# Altium PCB F101S3_KSDIY_V2.PcbDoc (part 1 of 2)
Units mil, origin at the board's own origin, x right, y up, seen from the top; angles counter-clockwise.
Board outline 2606.3 x 2883.86 mil, 2 copper layers (Top Layer, Bottom Layer), stack 54.726 mil thick; 152 components, 110 nets, 618 pads, 637 vias.
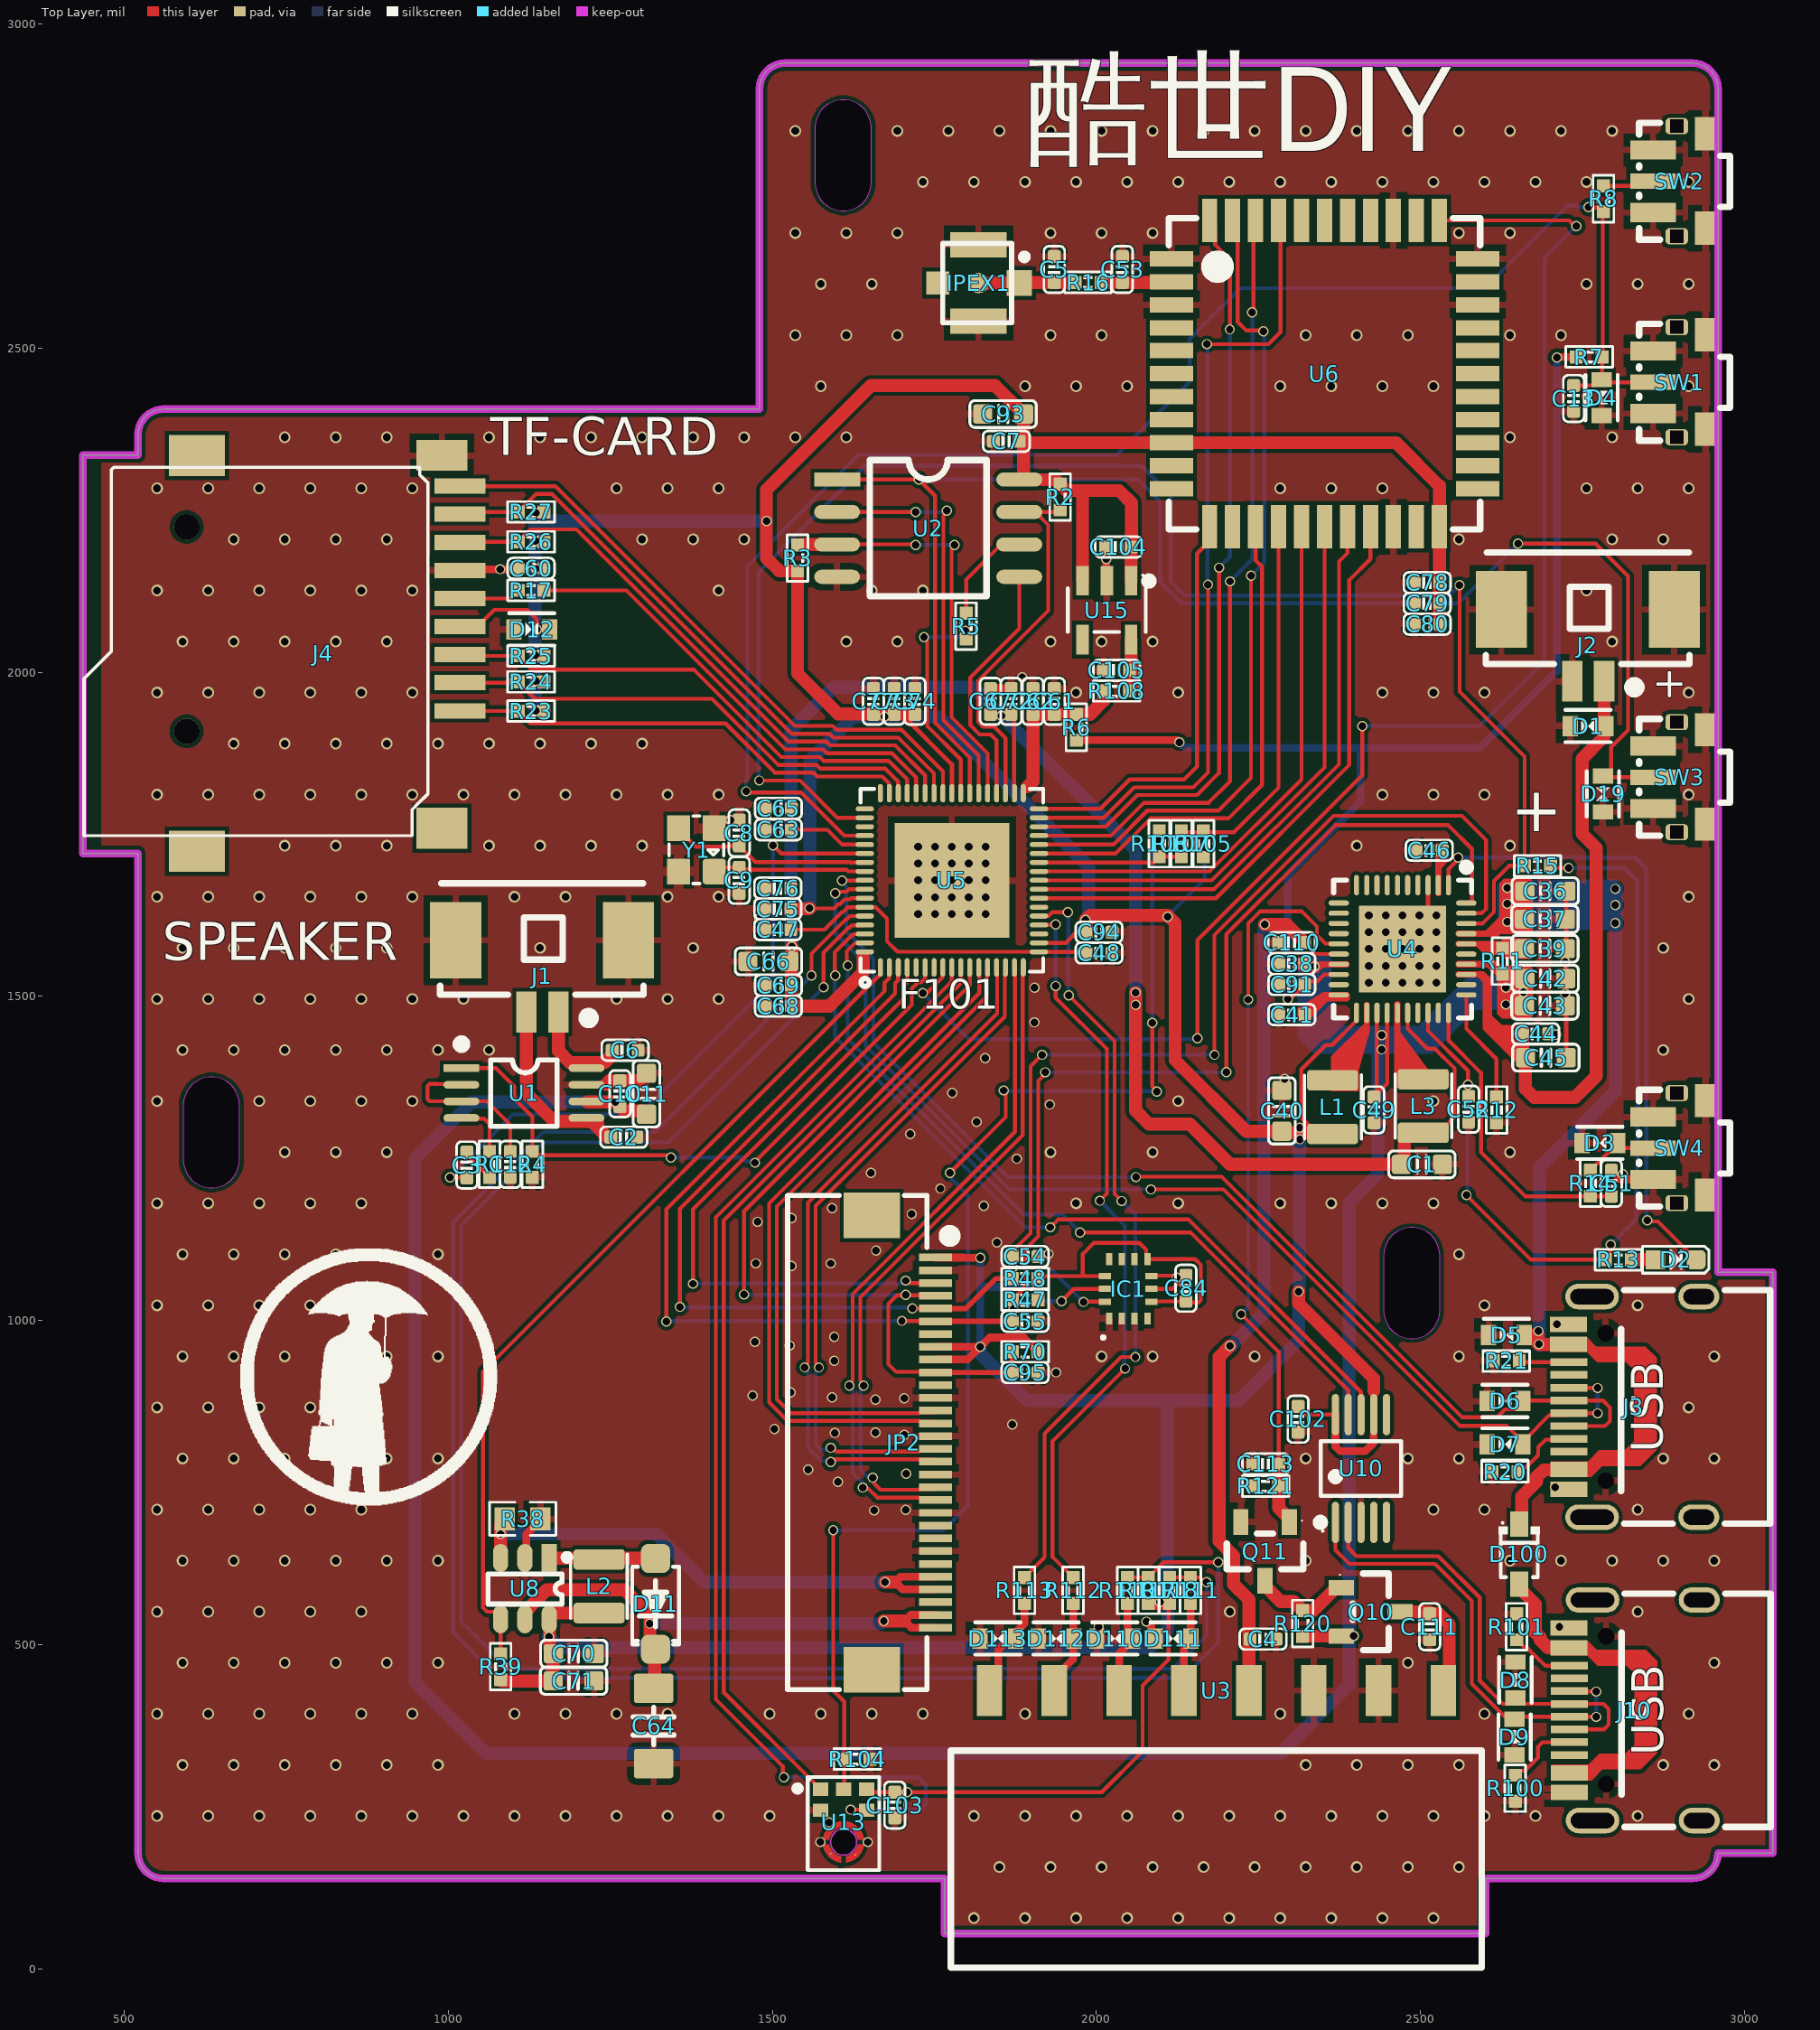
[diagram p0: Top Layer view]
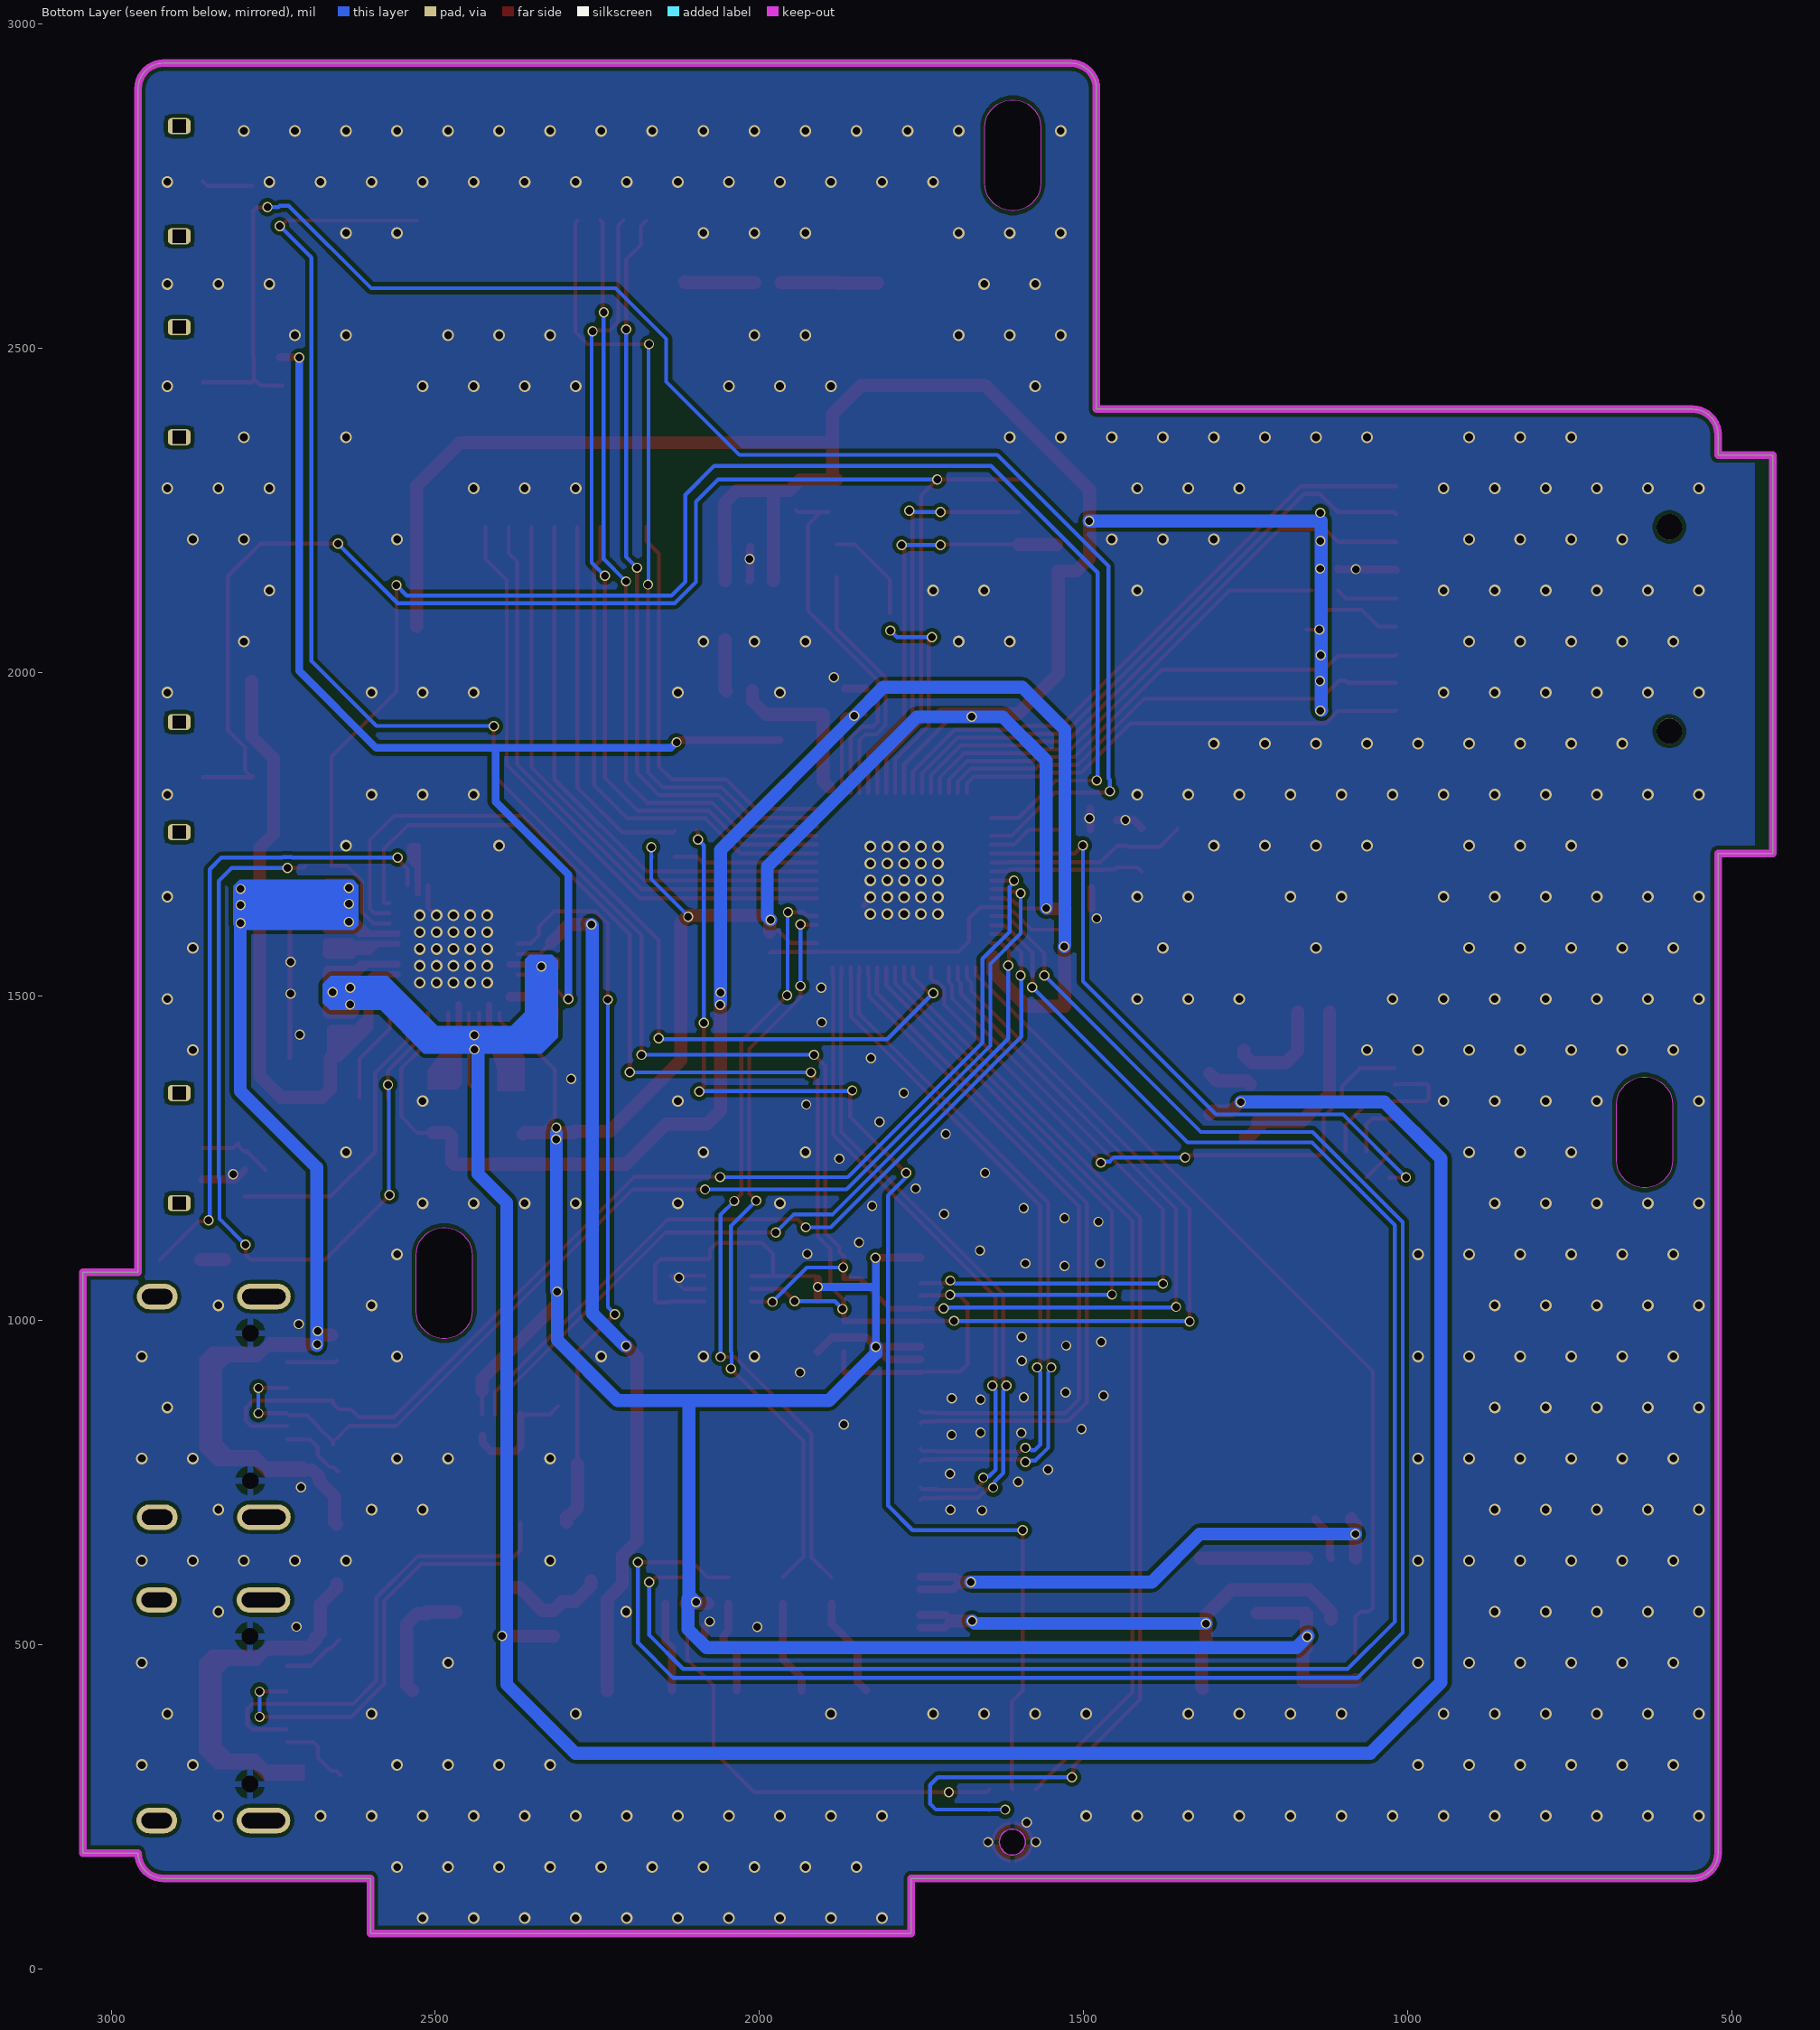
[diagram p1: Bottom Layer view, seen from below]
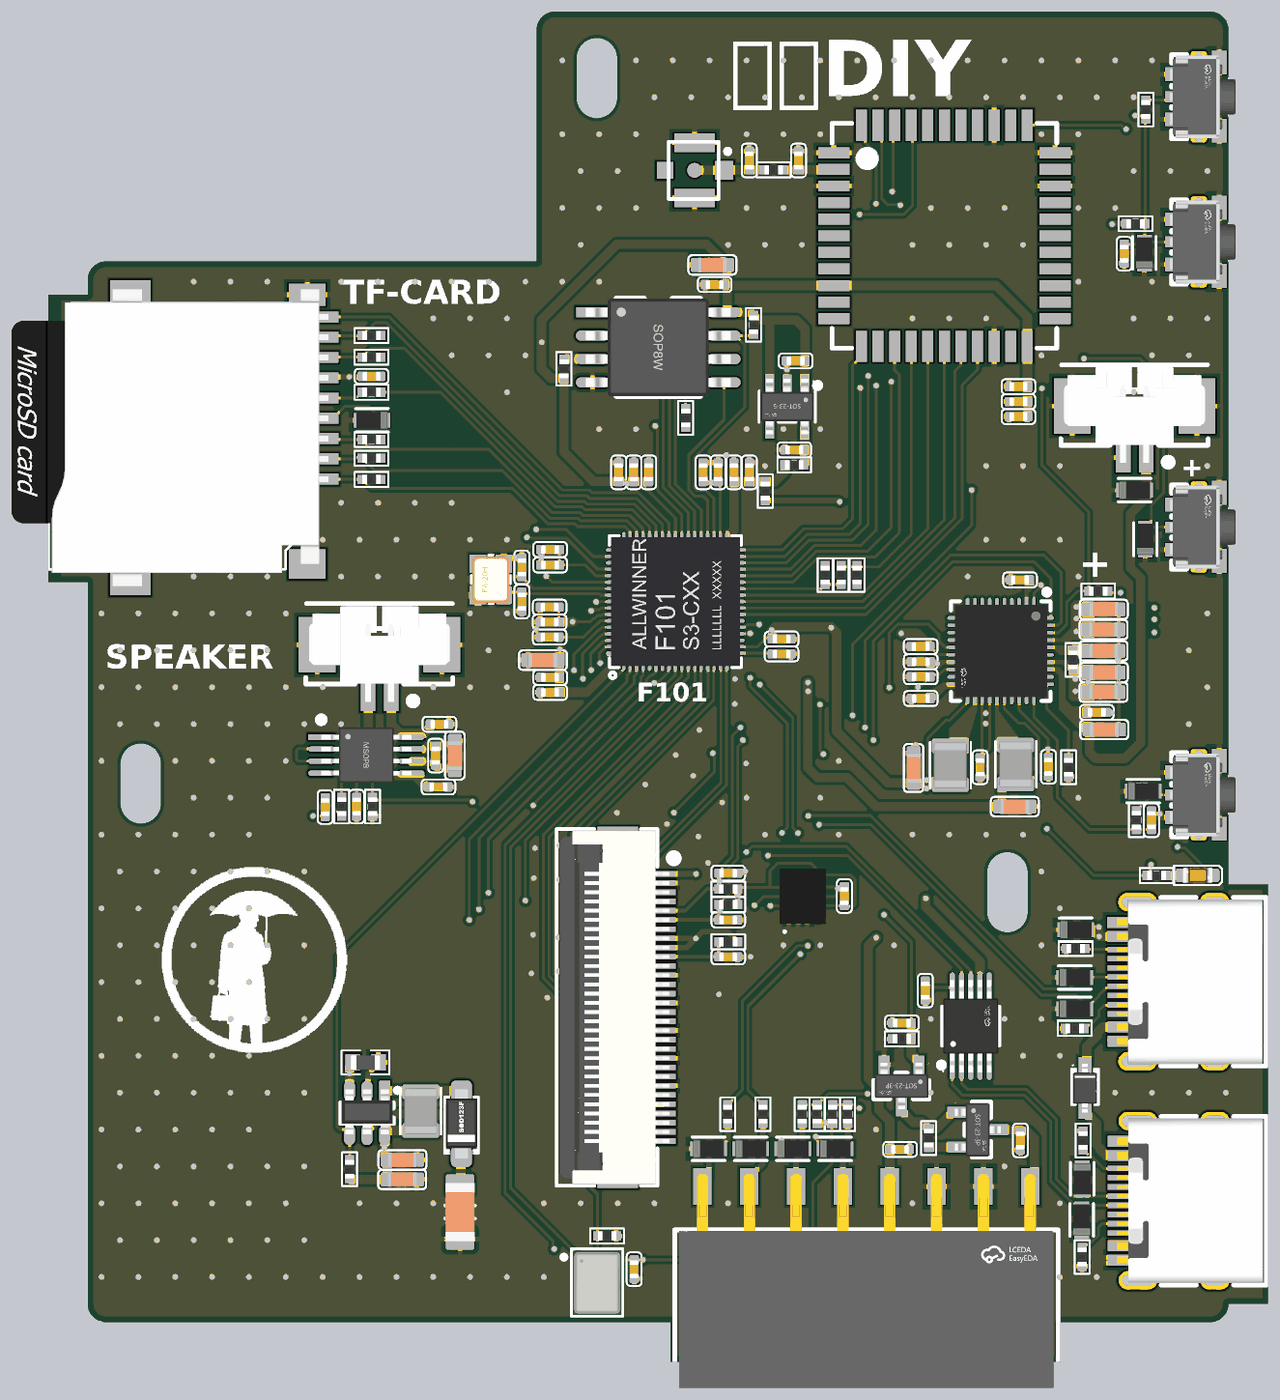
[diagram p3: 3D render of the assembled board from above, using the file's embedded part models]

## Layer stack, top to bottom
Top Solder: solder mask 0.4, Solder Resist, Dk 3.5
Top Layer: signal copper 1.378
Dielectric 1: dielectric 51.9701, FR-4, Dk 4.8
Bottom Layer: signal copper 1.378
Bottom Solder: solder mask 0.4, Solder Resist, Dk 3.5

## Board outline
437.01,1720.47 521.65,1720.47 521.65,179.13 ccw(c561.02,179.13) 561.02,139.76 1766,139.76 1766,55.12 2600,55.12 2600,139.76 2919.29,139.76 ccw(c2919.29,179.13) 2958.66,179.13 3043.31,179.13 3043.31,1074.8 2958.66,1074.8 2958.66,2899.61 ccw(c2919.29,2899.61) 2919.29,2938.98 1519.68,2938.98 ccw(c1519.68,2899.61) 1480.31,2899.61 1480.32,2405.51 561.02,2405.51 ccw(c561.02,2366.14) 521.65,2366.14 521.65,2334.65 437.01,2334.65
cut-out: 1590,196 ccw(c1610,196) 1610,176 ccw(c1610,196) 1630,196 ccw(c1610,196) 1610,216 ccw(c1610,196)
cut-out: 1566.03,2754.68 ccw(c1609.34,2754.68) 1652.65,2754.68 1652.65,2839.33 ccw(c1609.34,2839.33) 1566.03,2839.33
cut-out: 2442.99,1015.72 ccw(c2486.3,1015.72) 2529.61,1015.72 2529.61,1100.36 ccw(c2486.3,1100.36) 2442.99,1100.36
cut-out: 591.61,1247.94 ccw(c634.91,1247.94) 678.22,1247.94 678.22,1332.58 ccw(c634.91,1332.58) 591.61,1332.58

## Design rules (kind name [scope] priority, off if disabled: settings)
Clearance [All] p1: gap=6 ignorepadtopadclearanceinfootprint=FALSE
DiffPairsRouting [All] p1: maxlimit=10 minlimit=6 mostfreqgap=6 substack1={27B4698A-FF65-4D82-99C7-CD1E00C9736D} toplayer_{27b4698a-ff65-4d82-99c7-cd1e00c9736d}_mingap=10 toplayer_{27b4698a-ff65-4d82-99c7-cd1e00c9736d}_prefgap=10 toplayer_{27b4698a-ff65-4d82-99c7-cd1e00c9736d}_minwidth=15 toplayer_{27b4698a-ff65-4d82-99c7-cd1e00c9736d}_maxwidth=15 toplayer_{27b4698a-ff65-4d82-99c7-cd1e00c9736d}_prefwidth=15 bottomlayer_{27b4698a-ff65-4d82-99c7-cd1e00c9736d}_mingap=10 bottomlayer_{27b4698a-ff65-4d82-99c7-cd1e00c9736d}_prefgap=10 bottomlayer_{27b4698a-ff65-4d82-99c7-cd1e00c9736d}_minwidth=15 bottomlayer_{27b4698a-ff65-4d82-99c7-cd1e00c9736d}_maxwidth=15 bottomlayer_{27b4698a-ff65-4d82-99c7-cd1e00c9736d}_prefwidth=15 substack2={09CD6736-9CB1-482A-85FC-D9F62B0C0ECB} toplayer_{09cd6736-9cb1-482a-85fc-d9f62b0c0ecb}_mingap=10 toplayer_{09cd6736-9cb1-482a-85fc-d9f62b0c0ecb}_prefgap=10 toplayer_{09cd6736-9cb1-482a-85fc-d9f62b0c0ecb}_minwidth=15 toplayer_{09cd6736-9cb1-482a-85fc-d9f62b0c0ecb}_maxwidth=15 toplayer_{09cd6736-9cb1-482a-85fc-d9f62b0c0ecb}_prefwidth=15 bottomlayer_{09cd6736-9cb1-482a-85fc-d9f62b0c0ecb}_mingap=10 bottomlayer_{09cd6736-9cb1-482a-85fc-d9f62b0c0ecb}_prefgap=10 bottomlayer_{09cd6736-9cb1-482a-85fc-d9f62b0c0ecb}_minwidth=15 bottomlayer_{09cd6736-9cb1-482a-85fc-d9f62b0c0ecb}_maxwidth=15 bottomlayer_{09cd6736-9cb1-482a-85fc-d9f62b0c0ecb}_prefwidth=15 substack3={CDA90D9E-BF11-4F79-90A0-41A857C725F6} toplayer_{cda90d9e-bf11-4f79-90a0-41a857c725f6}_mingap=10 toplayer_{cda90d9e-bf11-4f79-90a0-41a857c725f6}_prefgap=10 toplayer_{cda90d9e-bf11-4f79-90a0-41a857c725f6}_minwidth=15 toplayer_{cda90d9e-bf11-4f79-90a0-41a857c725f6}_maxwidth=15 toplayer_{cda90d9e-bf11-4f79-90a0-41a857c725f6}_prefwidth=15 bottomlayer_{cda90d9e-bf11-4f79-90a0-41a857c725f6}_mingap=10 bottomlayer_{cda90d9e-bf11-4f79-90a0-41a857c725f6}_prefgap=10 bottomlayer_{cda90d9e-bf11-4f79-90a0-41a857c725f6}_minwidth=15 bottomlayer_{cda90d9e-bf11-4f79-90a0-41a857c725f6}_maxwidth=15 bottomlayer_{cda90d9e-bf11-4f79-90a0-41a857c725f6}_prefwidth=15 substack4={701BC14B-8258-4EEB-82A7-BC9EBD99672D} toplayer_{701bc14b-8258-4eeb-82a7-bc9ebd99672d}_mingap=10 toplayer_{701bc14b-8258-4eeb-82a7-bc9ebd99672d}_prefgap=10 toplayer_{701bc14b-8258-4eeb-82a7-bc9ebd99672d}_minwidth=15 toplayer_{701bc14b-8258-4eeb-82a7-bc9ebd99672d}_maxwidth=15 toplayer_{701bc14b-8258-4eeb-82a7-bc9ebd99672d}_prefwidth=15 bottomlayer_{701bc14b-8258-4eeb-82a7-bc9ebd99672d}_mingap=10 bottomlayer_{701bc14b-8258-4eeb-82a7-bc9ebd99672d}_prefgap=10 bottomlayer_{701bc14b-8258-4eeb-82a7-bc9ebd99672d}_minwidth=15 bottomlayer_{701bc14b-8258-4eeb-82a7-bc9ebd99672d}_maxwidth=15 bottomlayer_{701bc14b-8258-4eeb-82a7-bc9ebd99672d}_prefwidth=15 toplayer_minwidth=6 toplayer_maxwidth=15 toplayer_prefwidth=6 bottomlayer_minwidth=6 bottomlayer_maxwidth=15 bottomlayer_prefwidth=6 substack5={0A32EEB5-6733-4598-B21C-DA50A303FA46} toplayer_{0a32eeb5-6733-4598-b21c-da50a303fa46}_mingap=10 toplayer_{0a32eeb5-6733-4598-b21c-da50a303fa46}_prefgap=10 toplayer_{0a32eeb5-6733-4598-b21c-da50a303fa46}_minwidth=15 toplayer_{0a32eeb5-6733-4598-b21c-da50a303fa46}_maxwidth=15 toplayer_{0a32eeb5-6733-4598-b21c-da50a303fa46}_prefwidth=15 bottomlayer_{0a32eeb5-6733-4598-b21c-da50a303fa46}_mingap=10 bottomlayer_{0a32eeb5-6733-4598-b21c-da50a303fa46}_prefgap=10 bottomlayer_{0a32eeb5-6733-4598-b21c-da50a303fa46}_minwidth=15 bottomlayer_{0a32eeb5-6733-4598-b21c-da50a303fa46}_maxwidth=15 bottomlayer_{0a32eeb5-6733-4598-b21c-da50a303fa46}_prefwidth=15 substack6={C6E4A2C4-79AD-4DE6-A65B-24ED285F8ED2} toplayer_{c6e4a2c4-79ad-4de6-a65b-24ed285f8ed2}_mingap=10 toplayer_{c6e4a2c4-79ad-4de6-a65b-24ed285f8ed2}_prefgap=10 toplayer_{c6e4a2c4-79ad-4de6-a65b-24ed285f8ed2}_minwidth=15 toplayer_{c6e4a2c4-79ad-4de6-a65b-24ed285f8ed2}_maxwidth=15 toplayer_{c6e4a2c4-79ad-4de6-a65b-24ed285f8ed2}_prefwidth=15 bottomlayer_{c6e4a2c4-79ad-4de6-a65b-24ed285f8ed2}_mingap=10 bottomlayer_{c6e4a2c4-79ad-4de6-a65b-24ed285f8ed2}_prefgap=10 bottomlayer_{c6e4a2c4-79ad-4de6-a65b-24ed285f8ed2}_minwidth=15 bottomlayer_{c6e4a2c4-79ad-4de6-a65b-24ed285f8ed2}_maxwidth=15 bottomlayer_{c6e4a2c4-79ad-4de6-a65b-24ed285f8ed2}_prefwidth=15 substack7={218E24E0-C3BE-474F-8725-F676C7CCC05A} toplayer_{218e24e0-c3be-474f-8725-f676c7ccc05a}_mingap=10 toplayer_{218e24e0-c3be-474f-8725-f676c7ccc05a}_prefgap=10 toplayer_{218e24e0-c3be-474f-8725-f676c7ccc05a}_minwidth=15 toplayer_{218e24e0-c3be-474f-8725-f676c7ccc05a}_maxwidth=15 toplayer_{218e24e0-c3be-474f-8725-f676c7ccc05a}_prefwidth=15 bottomlayer_{218e24e0-c3be-474f-8725-f676c7ccc05a}_mingap=10 bottomlayer_{218e24e0-c3be-474f-8725-f676c7ccc05a}_prefgap=10 bottomlayer_{218e24e0-c3be-474f-8725-f676c7ccc05a}_minwidth=15 bottomlayer_{218e24e0-c3be-474f-8725-f676c7ccc05a}_maxwidth=15 bottomlayer_{218e24e0-c3be-474f-8725-f676c7ccc05a}_prefwidth=15 maxuncoupledlength=500
PlaneConnect [All] p1: pad.planeconnectstyle=Relief pad.reliefexpansion=20 pad.reliefentries=4 pad.reliefconductorwidth=10 pad.reliefairgap=10 via.planeconnectstyle=Direct via.reliefexpansion=20 via.reliefentries=4 via.reliefconductorwidth=10 via.reliefairgap=10
PolygonConnect [All] p1: thpad.connectstyle=Relief thpad.reliefconductorwidth=10 thpad.reliefentries=4 thpad.polygonreliefangle="90 Angle" thpad.airgapwidth=10 smdpad.connectstyle=Relief smdpad.reliefconductorwidth=10 smdpad.reliefentries=4 smdpad.polygonreliefangle="90 Angle" smdpad.airgapwidth=10 via.connectstyle=Direct via.reliefconductorwidth=10 via.reliefentries=4 via.polygonreliefangle="90 Angle" via.airgapwidth=10
RoutingVias [All] p1: holewidth=11.81 width=15.75 viastyle="Through Hole" minholewidth=11.81 minwidth=15.75 maxholewidth=19.68 maxwidth=27.56
SolderMaskExpansion [All] p1: expansion=4 istentingtop=FALSE
SupplyNets "Schematic Supply Nets_2" [InNet('VDD-SYS')] p1: voltage=0.000
SupplyNets "Schematic Supply Nets_1" [InNet('VCC_3V3')] p2: voltage=0.000
SupplyNets "Schematic Supply Nets_15" [InNet('ALDO1V8')] p3: voltage=0.000
SupplyNets "Schematic Supply Nets_13" [InNet('AXP_VSYS')] p4: voltage=0.000
SupplyNets "Schematic Supply Nets_7" [InNet('VCC_BAT_IN')] p5: voltage=0.000
SupplyNets "Schematic Supply Nets_5" [InNet('VRTC')] p6: voltage=0.000
SupplyNets "Schematic Supply Nets_9" [InNet('VBUS')] p7: voltage=0.000
SupplyNets "Schematic Supply Nets_4" [InNet('GND')] p8: voltage=0.000
Width [All] p1: maxlimit=100 minlimit=6 preferedwidth=12 substack1={27B4698A-FF65-4D82-99C7-CD1E00C9736D} toplayer_{27b4698a-ff65-4d82-99c7-cd1e00c9736d}_prefwidth=10 bottomlayer_{27b4698a-ff65-4d82-99c7-cd1e00c9736d}_prefwidth=10 substack2={09CD6736-9CB1-482A-85FC-D9F62B0C0ECB} toplayer_{09cd6736-9cb1-482a-85fc-d9f62b0c0ecb}_prefwidth=10 bottomlayer_{09cd6736-9cb1-482a-85fc-d9f62b0c0ecb}_prefwidth=10 substack3={CDA90D9E-BF11-4F79-90A0-41A857C725F6} toplayer_{cda90d9e-bf11-4f79-90a0-41a857c725f6}_prefwidth=10 bottomlayer_{cda90d9e-bf11-4f79-90a0-41a857c725f6}_prefwidth=10 substack4={701BC14B-8258-4EEB-82A7-BC9EBD99672D} toplayer_{701bc14b-8258-4eeb-82a7-bc9ebd99672d}_prefwidth=10 bottomlayer_{701bc14b-8258-4eeb-82a7-bc9ebd99672d}_prefwidth=10 substack5={0A32EEB5-6733-4598-B21C-DA50A303FA46} toplayer_{0a32eeb5-6733-4598-b21c-da50a303fa46}_prefwidth=10 bottomlayer_{0a32eeb5-6733-4598-b21c-da50a303fa46}_prefwidth=10 substack6={C6E4A2C4-79AD-4DE6-A65B-24ED285F8ED2} toplayer_{c6e4a2c4-79ad-4de6-a65b-24ed285f8ed2}_prefwidth=10 bottomlayer_{c6e4a2c4-79ad-4de6-a65b-24ed285f8ed2}_prefwidth=10 substack7={218E24E0-C3BE-474F-8725-F676C7CCC05A} toplayer_{218e24e0-c3be-474f-8725-f676c7ccc05a}_prefwidth=10 bottomlayer_{218e24e0-c3be-474f-8725-f676c7ccc05a}_prefwidth=10
28 further rules are at their usual default settings.

## Classes and differential pairs
component class F101S3_KSDIY_V2_EXT: C102 C103 C104 C105 C110 C111 C113 D8 D9 D100 D110 D111 D112 D113 J10 Q10 Q11 R100 R101 R104 R105 R106 R107 R108 R110 R111 R112 R113 R117 R118 R120 R121 U3 U10 U13 U15
component class F101S3_KSDIY_V2: C1 C2 C3 C4 C5 C6 C7 C8 C9 C10 C11 C12 C13 C36 C37 C38 C39 C40 C41 C42 C43 C44 C45 C46 C47 C48 C49 C51 C52 C53 C54 C55 C60 C61 C62 C63 C64 C65 C66 C67 C68 C69 C70 C71 C72 C73 C74 C75 C76 C77 C78 C79 C80 C84 C91 C93 C94 C95 D1 D2 D3 D4 D5 D6 D7 D11 D12 D19 IC1 IPEX1 J1 J2 J3 J4 JP2 L1 L2 L3 R1 R2 R3 R4 R5 R6 R7 R8 R11 R12 R13 R14 R15 R16 R17 R20 R21 R23 R24 R25 R26 R27 R38 R39 R47 R48 R70 SW1 SW2 SW3 SW4 U1 U2 U4 U5 U6 U8 Y1
differential pair DSI_D1: +DSI_D1_P -DSI_D1_N
differential pair DSI_D0: +DSI_D0_P -DSI_D0_N
differential pair DSI_CLK: +DSI_CLK_P -DSI_CLK_N

## Components (designator, comment, footprint, x,y, rotation, side; value= is the part's Value field where it differs from the comment)
C1 "22uF" 0603-C 2502,1241 r0 top
C2 "1nF" "CAP_0402 - G" 1271,1283 r0 top
C3 "0.1uF" "CAP_0402 - G" 1029,1240 r90 top
C4 "2.2uF" "CAP_0402 - G" 2257,509 r180 top
C5 "NC" "CAP_0402 - G" 1935,2621 r90 top
C6 "1nF" "CAP_0402 - G" 1273,1417 r180 top
C7 "0.1uF" "CAP_0402 - G" 1861,2356 r180 top
C8 "20pF" "CAP_0402 - G" 1449,1752 r90 top
C9 "20pF" "CAP_0402 - G" 1449,1679 r270 top
C10 "0.1uF" "CAP_0402 - G" 1265,1349.9 r90 top
C11 "22uF" 0603-C 1306,1349.9 r90 top
C12 "220nF" "CAP_0402 - G" 1096,1241 r90 top
C13 "100nF" "CAP_0402 - G" 2736,2422 r270 top
C36 "22uF" 0603-C 2692.27,1662.32 r180 top
C37 "22uF" 0603-C 2691.68,1619.11 r180 top
C38 "2.2uF" "CAP_0402 - G" 2301.27,1550.32 r180 top
C39 "22uF" 0603-C 2691.68,1573.55 r180 top
C40 "22uF" 0603-C 2286,1323.5 r90 top
C41 "2.2uF" "CAP_0402 - G" 2301.27,1471.89 r180 top
C42 "22uF" 0603-C 2692.27,1527.32 r180 top
C43 "22uF" 0603-C 2691.68,1485.55 r180 top
C44 "2.2uF" "CAP_0402 - G" 2677.27,1442.32 r180 top
C45 "22uF" 0603-C 2693.18,1405.55 r0 top
C46 "2.2uF" "CAP_0402 - G" 2513.27,1725.32 r0 top
C47 "2.2uF" "CAP_0402 - G" 1508.44,1603 r0 top
C48 "2.2uF" "CAP_0402 - G" 2004,1567 r180 top
C49 "2.2uF" "CAP_0402 - G" 2428,1325 r90 top
C51 "1nF" "CAP_0402 - G" 2794.2,1211.86 r90 top value=103
C52 "2.2uF" "CAP_0402 - G" 2574,1326 r270 top
C53 "NC" "CAP_0402 - G" 2040,2621 r90 top
C54 "22pF" "CAP_0402 - G" 1890,1099 r180 top
C55 "22pF" "CAP_0402 - G" 1890,999 r180 top
C60 "0.1uF" "CAP_0402 - G" 1128,2160 r180 top
C61 "2.2uF" "CAP_0402 - G" 1935,1955 r270 top
C62 "1uF" "CAP_0402 - G" 1901.98,1955 r270 top
C63 "10uF" "CAP_0402 - G" 1509.44,1757 r0 top
C64 "50V 10uF" 1206-C 1317,375 r90 top
C65 "100nF" "CAP_0402 - G" 1509.44,1790 r0 top
C66 "22uF" 0603-C 1494,1554 r0 top
C67 "2.2uF" "CAP_0402 - G" 1836.5,1955 r270 top
C68 "2.2uF" "CAP_0402 - G" 1509.44,1485 r0 top
C69 "1uF" "CAP_0402 - G" 1509.44,1517 r0 top
C70 "10uF" 0603-C 1194,486.5 r180 top
C71 "10uF" 0603-C 1193.5,444.5 r180 top
C72 "1uF" "CAP_0402 - G" 1868.5,1955 r270 top
C73 "100nF" "CAP_0402 - G" 1688,1955 r270 top
C74 "100nF" "CAP_0402 - G" 1720,1955 r270 top
C75 "100nF" "CAP_0402 - G" 1508.44,1635 r0 top
C76 "100nF" "CAP_0402 - G" 1508.44,1667 r0 top
C77 "100nF" "CAP_0402 - G" 1656,1955 r270 top
C78 "100nF" "CAP_0402 - G" 2510,2138 r180 top
C79 "100nF" "CAP_0402 - G" 2510,2106 r180 top
C80 "10uF" "CAP_0402 - G" 2510,2074 r180 top
C84 "0.1uF" "CAP_0402 - G" 2138,1050 r270 top
C91 "2.2uF" "CAP_0402 - G" 2301.27,1518.32 r0 top
C93 "22uF" 0603-C 1856,2398 r0 top
C94 "0.1uF" "CAP_0402 - G" 2004,1599 r180 top
C95 "1uF" "CAP_0402 - G" 1890,920 r180 top
C102 "100nF" "CAP_0402 - G" 2311,848 r270 top
C103 "100nF" "CAP_0402 - G" 1689,253 r270 top
C104 "1uF" "CAP_0402 - G" 2034,2193 r180 top
C105 "1uF" "CAP_0402 - G" 2031,2003 r180 top
C110 "1uF" "CAP_0402 - G" 2301,1583 r180 top
C111 "10uF" "CAP_0402 - G" 2514,528 r270 top
C113 "1uF" "CAP_0402 - G" 2261,779 r180 top
D1 "H5VND5B" SOD-523F_L1.7-W0.9-LS1.7-BI 2758,1917 r180 top
D2 "Red" 0603/1608-LED 2893.5,1094 r180 top
D3 "H5VND5B" SOD-523F_L1.7-W0.9-LS1.7-BI 2776.43,1274 r180 top
D4 "H5VND5B" SOD-523F_L1.7-W0.9-LS1.7-BI 2779,2423.43 r270 top
D5 "H5VND5B" SOD-523F_L1.7-W0.9-LS1.7-BI 2632.43,978 r180 top
D6 "NC" SOD-523F_L1.7-W0.9-LS1.7-BI 2630,876 r180 top
D7 "NC" SOD-523F_L1.7-W0.9-LS1.7-BI 2630,809 r180 top
D8 "NC" SOD-523F_L1.7-W0.9-LS1.7-BI 2646,446 r90 top
D9 "NC" SOD-523F_L1.7-W0.9-LS1.7-BI 2645,358 r270 top
D11 "DSK24" SOD-123F 1320,563.5 r90 top
D12 "H5VND5B" SOD-523F_L1.7-W0.9-LS1.7-BI 1129,2066 r0 top
D19 "H5VND5B" SOD-523F_L1.7-W0.9-LS1.7-BI 2781,1812 r270 top
D100 "1N5819WS" SOD-323_L1.8-W1.3-LS2.5-RD 2652,640 r270 top
D110 "H5VND5B" SOD-523F_L1.7-W0.9-LS1.7-BI 2028,510 r180 top
D111 "H5VND5B" SOD-523F_L1.7-W0.9-LS1.7-BI 2118,510 r180 top
D112 "H5VND5B" SOD-523F_L1.7-W0.9-LS1.7-BI 1938,510 r180 top
D113 "H5VND5B" SOD-523F_L1.7-W0.9-LS1.7-BI 1848,510 r180 top
IC1 "LSM6DS3TR-C" LGA-14(2.5X3X0.86) 2049,1049 r90 top
IPEX1 "2.4G" SMA_IPEX 1818.01,2600 r270 top
J1 "MX1.25-2P" "MX 1.25-WS-2P" 1144.85,1586.65 r180 top
J2 "MX1.25-2P" "MX 1.25-WS-2P" 2757.85,2096.65 r180 top
J3 "USB type C" "USB TYPE-C-16PIN_A" 2929,867 r90 top
J4 "TF-CARD H1.8" TF卡座 728,2039 r180 top
J10 "USB type C" "USB Type-C-16Pin_A" 2929.69,399.23 r90 top
JP2 "FPC1.0-30P" "FPC0.5 2H-WS-30P" 1653.54,812 r270 top locked
L1 "WPN201610M1R0MT" IND_CB2518_MM 2364.27,1329.32 r270 top
L2 "FTC252012S100MBCA" IND_CB2518_MM 1233,590.5 r90 top
L3 "WPN201610M1R0MT" IND_CB2518_MM 2504,1331 r270 top
Q10 "AO3401A" SOT-23_L2.9-W1.3-P1.90-LS2.4-BR 2423,551 r180 top
Q11 "2N7002" SOT-23_L2.9-W1.3-P1.90-LS2.4-BR 2260,644.28 r90 top
R1 "20K" "RES_0402 -G" 1064,1241 r270 top
R2 "10K" "RES_0402 -G" 1944,2270 r270 top
R3 "10K" "RES_0402 -G" 1539,2176 r90 top
R4 "10K" "RES_0402 -G" 1130,1241 r90 top
R5 "33R" "RES_0402 -G" 1799,2071 r90 top
R6 "0R" "RES_0402 -G" 1969,1915 r90 top
R7 "10K" "RES_0402 -G" 2760,2486 r0 top
R8 "10K" "RES_0402 -G" 2782,2730 r90 top value=3.3K
R11 "0R" "RES_0402 -G" 2626.27,1554.32 r270 top
R12 "SDNT1005X103F3950FTF" "RES_0402 -G" 2617,1325 r270 top
R13 "1K" "RES_0402 -G" 2805,1094 r180 top
R14 "510R" "RES_0402 -G" 2762,1212 r270 top
R15 "10K" "RES_0402 -G" 2680.27,1701.32 r0 top
R16 "0R" "RES_0402 -G" 1987,2601 r0 top
R17 "33R" "RES_0402 -G" 1128,2126 r0 top
R20 "5.1K" "RES_0402 -G" 2630,767 r0 top
R21 "5.1K" "RES_0402 -G" 2632,938 r180 top
R23 "51K" "RES_0402 -G" 1128,1940 r0 top
R24 "51K" "RES_0402 -G" 1128,1985 r0 top
R25 "51K" "RES_0402 -G" 1128,2025 r0 top
R26 "51K" "RES_0402 -G" 1128,2201 r0 top
R27 "51K" "RES_0402 -G" 1128,2247 r0 top
R38 "5.1R" 0603-R 1115,694.5 r180 top
R39 "10K" "RES_0402 -G" 1081,466.5 r270 top
R47 "2.2K" "RES_0402 -G" 1890,1032 r180 top
R48 "2.2K" "RES_0402 -G" 1890,1065 r180 top
R70 "10K" "RES_0402 -G" 1890,952 r180 top
R100 "5.1K" "RES_0402 -G" 2646,279 r270 top
R101 "5.1K" "RES_0402 -G" 2648,528 r90 top
R104 "100K" "RES_0402 -G" 1631,324 r0 top
R105 "10K" "RES_0402 -G" 2165,1735.5 r90 top
R106 "0R" "RES_0402 -G" 2097,1735.5 r90 top
R107 "NC" "RES_0402 -G" 2131,1735.5 r90 top
R108 "NC" "RES_0402 -G" 2031,1971 r180 top
R110 "33R" "RES_0402 -G" 2048,584 r270 top
R111 "33R" "RES_0402 -G" 2145,584 r270 top
R112 "100R" "RES_0402 -G" 1964,584 r270 top
R113 "100R" "RES_0402 -G" 1889,584 r270 top
R117 "4.7K" "RES_0402 -G" 2080,584 r90 top
R118 "4.7K" "RES_0402 -G" 2113,584 r90 top
R120 "100K" "RES_0402 -G" 2318,533 r90 top
R121 "100K" "RES_0402 -G" 2261,745 r180 top
SW1 "TSA020A3418A" SW-SMD_TSA020 2897,2447 r90 top
SW2 "TSA020A3418A" SW-SMD_TSA020 2897,2757 r90 top
SW3 "TSA020A3418A" SW-SMD_TSA020 2897,1838 r90 top
SW4 "TSA020A3418A" SW-SMD_TSA020 2897,1266 r90 top
U1 "NS4150B" MSOP8_N 1117,1351 r270 top
U2 "W25Q128JV" SOP8W 1740.49,2222 r0 top
U3 "HX PM2.54-1x8P WT" HDR-SMD_8P-P2.54-H-F-W8.5 2185,429.45 r0 top
U4 "AXP2101" QFN-40_L5.0-W5.0-P0.40-TL-EP3.4 2470.42,1572.28 r270 top
U5 "" QFN-68_L7.0-W7.0-P0.35-TL-EP4.5 1777,1679 r90 top
U6 "" WIRELM-SMD_BL-M8800MT1-40B 2351.73,2460.22 r0 top value=AIC8800D80
U8 "SY7200" SOT-23-6 1155.8,633.99 r270 top
U10 "CH340E" MSOP-10_CH340E 2408,772 r0 top
U13 "ICS-43434" MIC-SMD_6P-L3.5-W2.7-P0.90-BL 1609.81,226.87 r270 top
U15 "ME6211C12M5G-N" SOT-23-5_ME6211 2015.9,2095.5 r180 top
Y1 "SX2B40.000F1510F30" XTAL-2520 1383,1726 r90 top

## Footprints (in the part's own frame and the unit in brackets; to place one, negate y for a bottom-side part, rotate by r counter-clockwise, add the part's x,y. Pads: shape width x height; smd on the part's side, far side on the other; paste and mask are expansions set on the pad)
0603-C [mm] "Murata & TDK 0603,25V,±10%,X7R,SERAMIC"
  rrect25% 0.75x0.75 smd paste+0 mask+0.051: 1(-0.8,0) 2(0.8,0)
  silkscreen extent -1.3,-0.53 1.3,0.53, body extent -0.8,-0.41 0.8,0.39, height 0.8
0603-R [mm] "Chip Capacitor; Body 1.6 x 0.8 mm (LxW typ)"
  rect 0.8x0.9 smd: 1(-0.7,0) 2(0.7,0)
  silkscreen extent -1.3,-0.65 1.3,0.65, body extent -0.8,-0.4 0.8,0.4, height 0.38
0603/1608-LED [mm]
  rect 0.75x0.75 smd mask+0.051: 1(0.8,0)
  rrect50% 0.75x0.75 smd mask+0.051: 2(-0.8,0)
  silkscreen extent -1.3,-0.53 1.3,0.53, body extent -0.79,-0.4 0.81,0.4, height 0.79
1206-C [mm]
  rrect20% 1.15x1.55 smd mask+0.051: 1(-1.475,0) 2(1.475,0)
  silkscreen extent -0.73,-0.8 0.73,0.8, body extent -1.6,-0.8 1.6,0.8, height 1.61
"CAP_0402 - G" [mil]
  rrect35% 20x20 smd mask+2: 1(-20,0) 2(20,0)
  silkscreen extent -36,-16 36,16, body extent -20,-10 20,10, height 20
"FPC0.5 2H-WS-30P" [mm] "长：19.2mm，宽：5.2mm，高：2mm"
  rect 1.8x2.2 smd: 0(-8.9,0) 0(8.9,0)
  rect 0.3x1.3 smd: 1(-7.25,2.497) 2(-6.75,2.497) 3(-6.25,2.497) 4(-5.75,2.497) 5(-5.25,2.497) 6(-4.75,2.497) 7(-4.25,2.497) 8(-3.75,2.497) 9(-3.25,2.497) 10(-2.75,2.497) 11(-2.25,2.497) 12(-1.75,2.497) 13(-1.25,2.497) 14(-0.75,2.497) 15(-0.25,2.497) 16(0.25,2.497) 17(0.75,2.497) 18(1.25,2.497) 19(1.75,2.497) 20(2.25,2.497) 21(2.75,2.497) 22(3.25,2.497) 23(3.75,2.497) 24(4.25,2.497) 25(4.75,2.497) 26(5.25,2.497) 27(5.75,2.497) 28(6.25,2.497) 29(6.75,2.497) 30(7.25,2.497)
  silkscreen extent -9.68,-3.3 9.68,3.23, body extent -9.6,-3.15 9.6,2.85, height 2
HDR-SMD_8P-P2.54-H-F-W8.5 [mm] "配套排针：HX PZ2.54-1x8P系列 1x8P 间距:2.54mm 卧贴 插孔结构:1x8P 间距:2.54mm 行距:- 圆孔/方孔:方孔 安装方式:卧贴 排数:单排 总孔位数:8P 额定电流:3A 额定电压:1kV 插孔方向:顶部 塑高:8.5mm 触头材质:黄铜 触头镀层:金 工作温度:-40℃~+105℃ 型号:HX PM2.54-1x8P WT LCSC C46061772 厂牌:"
  rect 1x2 smd mask+0.05: 1(-8.89,0) 2(-6.35,0) 3(-3.81,0) 4(-1.27,0) 5(1.27,0) 6(3.81,0) 7(6.35,0) 8(8.89,0)
  silkscreen extent -10.46,-10.91 10.4,-2.35, body extent -10.16,-10.91 10.16,0.69, height 2.53
IND_CB2518_MM [mm] "IND_CB2518_MM"
  rrect30% 0.8x2 smd mask+0.051: 1(-1.05,0) 2(1.05,0)
  silkscreen extent -1.26,-1.1 1.25,1.12, body extent -1.25,-0.9 1.25,0.9, height 0.85
LGA-14(2.5X3X0.86) [mm]
  rect 0.475x0.25 smd: 1(-1.163,0.75) 2(-1.163,0.25) 3(-1.163,-0.25) 4(-1.163,-0.75) 8(1.162,-0.75) 9(1.162,-0.25) 10(1.162,0.25) 11(1.162,0.75)
  rect 0.25x0.475 smd: 5(-0.5,-0.913) 6(0,-0.913) 7(0.5,-0.913) 12(0.5,0.913) 13(0,0.912) 14(-0.5,0.913)
  silkscreen extent -1.93,0.95 -1.88,1.01, body extent -1.5,-1.25 1.5,1.25, height 0.86
MIC-SMD_6P-L3.5-W2.7-P0.90-BL [mm] "1.65V~3.63V 停产 指向性:全指向 信噪比:64dB 灵敏度:-26dB 阻抗:- 型号:ICS-43434_C5656610 LCSC C5656610 厂牌:TDK InvenSense(应美盛)"
  rect 0.52x0.6 smd mask+0.05: 1(-1.286,-0.9) 2(-0.464,-0.9) 4(-0.464,0.9) 5(-1.286,0.9) 6(-1.286,0)
  round 0.06 smd mask+0: 3(0.276,-0.452) 3(0.329,0.505) 3(1.233,-0.505) 3(1.286,0.452)
  Top Layer region: 0.879,0.807 0.879,0.554 0.879,0.554 0.913,0.547 0.946,0.538 0.978,0.527 1.01,0.514 1.041,0.499 1.071,0.483 1.1,0.464 1.128,0.444 1.154,0.422 1.179,0.398 1.203,0.373 1.225,0.347 1.245,0.319 1.264,0.29 1.281,0.26 1.296,0.229 1.309,0.197 1.32,0.165 1.329,0.131 1.336,0.098 1.587,0.098 1.588,0.099 1.582,0.14 1.574,0.18 1.564,0.221 1.551,0.26 1.537,0.299 1.521,0.337 1.503,0.375 1.482,0.411 1.461,0.446 1.437,0.48 1.412,0.513 1.385,0.545 1.356,0.575 1.326,0.603 1.294,0.63 1.262,0.656 1.228,0.679 1.192,0.701 1.156,0.721 1.119,0.739 1.081,0.756 1.042,0.77 1.002,0.782 0.962,0.793 0.921,0.801 0.88,0.807 0.879,0.807
  Top Layer region: 1.588,-0.098 1.336,-0.098 1.336,-0.098 1.329,-0.131 1.32,-0.165 1.309,-0.197 1.296,-0.229 1.281,-0.26 1.264,-0.29 1.245,-0.319 1.225,-0.347 1.203,-0.373 1.179,-0.398 1.154,-0.422 1.128,-0.444 1.1,-0.464 1.071,-0.483 1.041,-0.499 1.01,-0.514 0.978,-0.527 0.946,-0.538 0.913,-0.547 0.879,-0.554 0.879,-0.806 0.88,-0.807 0.921,-0.801 0.962,-0.793 1.002,-0.782 1.042,-0.77 1.08,-0.756 1.119,-0.74 1.156,-0.721 1.192,-0.701 1.227,-0.679 1.262,-0.656 1.294,-0.63 1.326,-0.603 1.356,-0.575 1.385,-0.545 1.412,-0.513 1.437,-0.48 1.461,-0.446 1.482,-0.411 1.503,-0.375 1.521,-0.338 1.537,-0.299 1.551,-0.26 1.564,-0.221 1.574,-0.181 1.582,-0.14 1.588,-0.099 1.588,-0.098
  Top Layer region: 0.684,-0.807 0.684,-0.555 0.683,-0.554 0.65,-0.547 0.617,-0.538 0.584,-0.527 0.552,-0.514 0.521,-0.499 0.491,-0.483 0.462,-0.464 0.435,-0.444 0.408,-0.422 0.383,-0.398 0.36,-0.373 0.338,-0.347 0.317,-0.319 0.299,-0.29 0.282,-0.26 0.267,-0.229 0.254,-0.197 0.243,-0.165 0.234,-0.131 0.227,-0.098 -0.025,-0.098 -0.026,-0.099 -0.02,-0.14 -0.011,-0.18 -0.001,-0.221 0.011,-0.26 0.025,-0.299 0.042,-0.337 0.06,-0.375 0.08,-0.411 0.102,-0.446 0.125,-0.48 0.151,-0.513 0.178,-0.545 0.206,-0.575 0.236,-0.603 0.268,-0.63 0.301,-0.656 0.335,-0.679 0.37,-0.701 0.406,-0.721 0.444,-0.739 0.482,-0.756 0.521,-0.77 0.561,-0.782 0.601,-0.793 0.641,-0.801 0.682,-0.807 0.684,-0.807
  Top Layer region: -0.026,0.098 0.227,0.098 0.227,0.098 0.234,0.131 0.243,0.165 0.254,0.197 0.267,0.229 0.282,0.26 0.299,0.29 0.317,0.319 0.338,0.347 0.36,0.373 0.383,0.398 0.408,0.422 0.435,0.444 0.462,0.464 0.491,0.483 0.521,0.499 0.552,0.514 0.584,0.527 0.617,0.538 0.65,0.547 0.683,0.554 0.683,0.806 0.682,0.807 0.641,0.801 0.601,0.793 0.561,0.782 0.521,0.77 0.482,0.756 0.444,0.74 0.406,0.721 0.37,0.701 0.335,0.679 0.301,0.656 0.268,0.63 0.237,0.603 0.206,0.575 0.178,0.545 0.151,0.513 0.125,0.48 0.102,0.446 0.08,0.411 0.06,0.375 0.042,0.337 0.025,0.299 0.011,0.26 -0.001,0.221 -0.011,0.181 -0.02,0.14 -0.026,0.099 -0.026,0.098
  silkscreen extent -1.76,-1.92 1.89,1.4, body extent -1.86,-2.02 1.99,1.5, height 1
MSOP8_N [mm] "塑封体长3mm，宽3mm，脚距0.65"
  rect 0.3x1.4 smd: 1(-0.975,-2.45)
  oval 0.3x1.4 smd: 2(-0.325,-2.45) 3(0.325,-2.45) 4(0.975,-2.45) 5(0.975,2.45) 6(0.325,2.45) 7(-0.325,2.45) 8(-0.975,2.45)
  silkscreen extent -2.07,-2.6 1.3,1.3, body extent -1.5,-2.45 1.5,2.45, height 0.95
MSOP-10_CH340E [mm] "USB转串口芯片CH340 应用功能:收发器 USB协议版本:USB 2.0 数据速率:2Mbps 型号:CH340E LCSC C99652 厂牌:WCH(南京沁恒)"
  rrect100% 0.28x1.62 smd mask+0.05: 1(-1,-2.11) 2(-0.5,-2.11) 3(0,-2.11) 4(0.5,-2.11) 5(1,-2.11) 6(1,2.11) 7(0.5,2.11) 8(0,2.11) 9(-0.5,2.11) 10(-1,2.11)
  silkscreen extent -1.74,-2.51 1.58,1.07, body extent -1.84,-3.02 1.68,3.02, height 1
"MX 1.25-WS-2P" [mm] "长：7.65mm，宽：4.2mm，高：3.4mm"
  rect 2x3 smd: 0(-3.382,0) 0(3.382,0)
  rect 0.8x1.6 smd: 1(-0.639,2.811) 2(0.611,2.811)
  silkscreen extent -3.98,-2.23 4,3.25, body extent -3.83,-2.1 3.83,3.09, height 3.4
QFN-40_L5.0-W5.0-P0.40-TL-EP3.4 [mm]
  oval 0.8x0.2 smd paste-100 mask+0.05: 1(-2.521,1.842) 2(-2.521,1.442) 3(-2.521,1.041) 4(-2.521,0.641) 5(-2.521,0.241) 6(-2.521,-0.158) 7(-2.521,-0.558) 8(-2.521,-0.959) 9(-2.521,-1.359) 10(-2.521,-1.759) 21(2.477,-1.759) 22(2.477,-1.359) 23(2.477,-0.959) 24(2.477,-0.558) 25(2.477,-0.158) 26(2.477,0.241) 27(2.477,0.641) 28(2.477,1.041) 29(2.477,1.442) 30(2.477,1.842)
  oval 0.2x0.8 smd paste-100 mask+0.05: 11(-1.822,-2.458) 12(-1.422,-2.458) 13(-1.022,-2.458) 14(-0.622,-2.458) 15(-0.222,-2.458) 16(0.178,-2.458) 17(0.578,-2.458) 18(0.978,-2.458) 19(1.378,-2.458) 20(1.778,-2.458) 31(1.778,2.541) 32(1.378,2.541) 33(0.978,2.541) 34(0.578,2.541) 35(0.178,2.541) 36(-0.222,2.541) 37(-0.622,2.541) 38(-1.022,2.541) 39(-1.422,2.541) 40(-1.822,2.541)
  rect 3.4x3.4 smd paste-100 mask+0.05: 41(-0.022,0.041)
  silkscreen extent -3.37,-2.66 2.68,2.74, body extent -2.53,-2.45 2.47,2.55, height 0.85
QFN-68_L7.0-W7.0-P0.35-TL-EP4.5 [mm]
  oval 0.723x0.196 smd paste-100 mask+0.051: 1(-3.411,2.8) 2(-3.411,2.45) 3(-3.411,2.1) 4(-3.411,1.75) 5(-3.411,1.4) 6(-3.411,1.05) 7(-3.411,0.7) 8(-3.411,0.35) 9(-3.411,0) 10(-3.411,-0.35) 11(-3.411,-0.7) 12(-3.411,-1.05) 13(-3.411,-1.4) 14(-3.411,-1.75) 15(-3.411,-2.1) 16(-3.411,-2.45) 17(-3.411,-2.8) 35(3.411,-2.8) 36(3.411,-2.45) 37(3.411,-2.1) 38(3.411,-1.75) 39(3.411,-1.4) 40(3.411,-1.05) 41(3.411,-0.7) 42(3.411,-0.35) 43(3.411,0) 44(3.411,0.35) 45(3.411,0.7) 46(3.411,1.05) 47(3.411,1.4) 48(3.411,1.75) 49(3.411,2.1) 50(3.411,2.45) 51(3.411,2.8)
  oval 0.196x0.723 smd paste-100 mask+0.051: 18(-2.8,-3.411) 19(-2.45,-3.411) 20(-2.1,-3.411) 21(-1.75,-3.411) 22(-1.4,-3.411) 23(-1.05,-3.411) 24(-0.7,-3.411) 25(-0.35,-3.411) 26(0,-3.411) 27(0.35,-3.411) 28(0.7,-3.411) 29(1.05,-3.411) 30(1.4,-3.411) 31(1.75,-3.411) 32(2.1,-3.411) 33(2.45,-3.411) 34(2.8,-3.411) 52(2.8,3.411) 53(2.45,3.411) 54(2.1,3.411) 55(1.75,3.411) 56(1.4,3.411) 57(1.05,3.411) 58(0.7,3.411) 59(0.35,3.411) 60(0,3.411) 61(-0.35,3.411) 62(-0.7,3.411) 63(-1.05,3.411) 64(-1.4,3.411) 65(-1.75,3.411) 66(-2.1,3.411) 67(-2.45,3.411) 68(-2.8,3.411)
  rect 4.5x4.5 smd paste-100 mask+0.051: 69(0,0)
  silkscreen extent -4.16,-3.58 3.58,3.58, body extent -3.5,-3.5 3.5,3.5, height 0.9
"RES_0402 -G" [mil]
  rrect10% 20x20 smd mask+2: 1(-20,0) 2(20,0)
  silkscreen extent -36,-16 36,16, body extent -20,-10 20,10, height 14
SMA_IPEX [mm] "小型贴片IPEX天线座"
  rect 1x1 smd: 1(0,1.6)
  round 0.8 smd: 1(0,0)
  rect 1x2.2 smd: 2(-1.496,0) 2(1.496,0)
  rect 0.9x0.9 smd: 3(0,-1.6)
  Top Layer lines w0.5: 0,0 0,1.6
  silkscreen extent -1.55,-1.4 1.55,1.92
SOD-123F [mil] "二极管"
  rrect50% 45x45 smd: 1(70,0) 2(-70,0)
  silkscreen extent -63,-36 57,36, body extent -74,-33 74,33, height 47
SOD-323_L1.8-W1.3-LS2.5-RD [mm] "电压:40V 电流:1A 正向压降(Vf):600mV@1A 直流反向耐压(Vr):40V 整流电流:1A 型号:1N5819WS_C191023 LCSC C191023 厂牌:Hottech(合科泰)"
  rect 1x0.7 smd mask+0.05: 1(-1.172,0) 2(1.172,0)
  silkscreen extent -1.29,-0.8 0.9,0.8, body extent -1.77,-0.9 1.77,0.9, height 1
SOD-523F_L1.7-W0.9-LS1.7-BI [mm]
  rect 0.6x0.8 smd paste+0 mask+0.05: 1(-0.7,0) 2(0.7,0)
  silkscreen extent -0.89,-0.64 0.89,0.64, body extent -0.85,-0.45 0.85,0.45, height 0.77
SOP8W [mm] "5.3*8.3*1.8mm（长宽高）"
  rect 1.8x0.55 smd: 1(-3.556,1.905)
  oval 1.8x0.55 smd: 2(-3.569,0.635) 3(-3.569,-0.635) 4(-3.569,-1.905) 5(3.569,-1.905) 6(3.569,-0.635) 7(3.569,0.635) 8(3.569,1.905)
  silkscreen extent -2.29,-2.67 2.29,2.67, body extent -3.94,-2.64 3.94,2.64, height 1.9
SOT-23-5_ME6211 [mm] "1.2V 300mA 6V 输出极性:正极 工作电压:6V 输出电压:1.2V 输出电流:300mA 电源纹波抑制比(PSRR):70dB@(1kHz) 输出类型:固定 型号:ME6211C12M5G-N LCSC C236672 厂牌:MICRONE(南京微盟)"
  rect 0.49x1.157 smd mask+0.05: 1(-0.95,-1.154) 2(0,-1.154) 3(0.95,-1.154)
  rect 0.49x1.175 smd mask+0.05: 4(0.95,1.154) 5(-0.95,1.154)
  silkscreen extent -1.8,-1.43 1.53,0.85, body extent -1.9,-1.96 1.63,1.84, height 1
SOT-23-6 [mm]
  rect 1.1x0.6 smd: 1(0,0)
  oval 1.1x0.6 smd: 2(0,-0.95) 3(0,-1.9) 4(2.4,-1.9) 5(2.4,-0.95) 6(2.4,0)
  silkscreen extent -0.15,-2.4 1.8,0.83, body extent -0.07,-2.34 2.35,0.45, height 1.09
SOT-23_L2.9-W1.3-P1.90-LS2.4-BR [mm] "1个P沟道 耐压:30V 电流:4A 数量:1个P沟道 漏源电压(Vdss):30V 连续漏极电流(Id):4A 导通电阻(RDS(on)):47mΩ@10V；85mΩ@2.5V；60mΩ@4.5V 耗散功率(Pd):- 阈值电压(Vgs(th)):900mV 型号:AO3401A_C15127 LCSC C15127 厂牌:AOS"
  rect 1x0.6 smd mask+0.05: 1(1.15,-0.95) 2(1.15,0.95) 3(-1.15,0)
  silkscreen extent -0.7,-1.5 1.23,1.5, body extent -1.75,-1.6 2,1.6, height 1
SW-SMD_TSA020 [mm] "4*5*3.4H-J 180gf 笑脸PPA 电路结构:单刀单掷 按钮形状:圆形按钮 作用力:1.8N 安装方式:卧贴 开关长度:4.5mm 开关宽度:3.4mm 开关高度:3.4mm 带支架:带支架 触点电流:50mA 额定电压:12V 带灯:无 工作寿命:- 型号:TSA020A3418A LCSC C2888437 厂牌:BZCN(博众电气)"
  rrect50% 0.635x0.889 hole 0.508 square: 0(-2.154,0.048) 0(2.159,0.048)
  rect 0.75x1.8 smd mask+0.05: 1(-1.225,0.975) 3(1.225,0.975)
  rect 0.6x1.8 smd mask+0.05: 2(0,0.975)
  rect 1.3x0.813 smd mask+0.05: 4(-1.838,-1.065) 5(1.862,-1.065)
  silkscreen extent -2.31,-2.03 2.29,1.66, body extent -2.25,-1.94 2.25,1.61, height 3.35
TF卡座 [mm]
  round 1 hole 1 unplated: 0(3.334,-4.696) 0(3.334,3.305)
  rect 2x0.6 smd: 1(-7.366,2.505) 2(-7.366,1.405) 3(-7.366,0.305) 4(-7.366,-0.795) 5(-7.366,-1.895) 6(-7.366,-2.995) 7(-7.366,-4.095) 8(-7.366,-5.195) 9(-7.366,-6.295)
  rect 2x1.2 smd: 10(-6.666,-7.495)
  rect 2.2x1.6 smd: 11(2.934,-7.495) 12(2.934,8.005)
  rect 2x1.6 smd: 13(-6.666,7.105)
  silkscreen extent -6.12,-7.04 7.35,7.4, body extent -7.82,-7.8 9.38,8.3, height 2.2
"USB TYPE-C-16PIN_A" [mm]
  round 0 hole 0.65: 0(-2.89,3.65) 0(2.89,3.65)
  oval 1x1.6 hole 0.6 slot 1.2 at 90 deg: 1(-4.32,0) 1(4.32,0)
  oval 1x2.1 hole 0.6 slot 1.7 at 90 deg: 1(-4.32,4.18) 1(4.32,4.18)
  rect 0.3x1.45 smd: A1(-3.375,5.092) A4(-2.6,5.092) A5(-1.25,5.092) A6(-0.25,5.092) A7(0.25,5.092) A8(-1.75,5.092) A9(2.6,5.1) A12(3.375,5.1) B1(3.075,5.1) B4(2.3,5.1) B5(1.75,5.092) B6(0.75,5.092) B7(-0.75,5.092) B8(1.25,5.092) B9(-2.3,5.092) B12(-3.075,5.092)
  silkscreen extent -4.57,-2.79 4.57,3.05, body extent -4.47,-2.6 4.47,5.3, height 3.25
"USB Type-C-16Pin_A" [mm]
  round 0 hole 0.65: 0(-2.89,3.65) 0(2.89,3.65)
  oval 1x1.6 hole 0.6 slot 1.2 at 90 deg: 1(-4.32,0) 1(4.32,0)
  oval 1x2.1 hole 0.6 slot 1.7 at 90 deg: 1(-4.32,4.18) 1(4.32,4.18)
  rect 0.3x1.45 smd: A1(-3.375,5.092) A4(-2.6,5.092) A5(-1.25,5.092) A6(-0.25,5.092) A7(0.25,5.092) A8(-1.75,5.092) A9(2.6,5.1) A12(3.375,5.1) B1(3.075,5.1) B4(2.3,5.1) B5(1.75,5.092) B6(0.75,5.092) B7(-0.75,5.092) B8(1.25,5.092) B9(-2.3,5.092) B12(-3.075,5.092)
  silkscreen extent -4.57,-2.79 4.57,3.05, body extent -4.47,-2.6 4.47,5.3, height 3.25
WIRELM-SMD_BL-M8800MT1-40B [mm]
  rect 1.7x0.6 smd: 1(-6,4.5) 2(-6,3.6) 3(-6,2.7) 4(-6,1.8) 5(-6,0.9) 6(-6,0) 7(-6,-0.9) 8(-6,-1.8) 9(-6,-2.7) 10(-6,-3.6) 11(-6,-4.5) 23(6,-4.5) 24(6,-3.6) 25(6,-2.7) 26(6,-1.8) 27(6,-0.9) 28(6,0) 29(6,0.9) 30(6,1.8) 31(6,2.7) 32(6,3.6) 33(6,4.5)
  rect 0.6x1.7 smd: 12(-4.5,-6) 13(-3.6,-6) 14(-2.7,-6) 15(-1.8,-6) 16(-0.9,-6) 17(0,-6) 18(0.9,-6) 19(1.8,-6) 20(2.7,-6) 21(3.6,-6) 22(4.5,-6) 34(4.5,6) 35(3.6,6) 36(2.7,6) 37(1.8,6) 38(0.9,6) 39(0,6) 40(-0.9,6) 41(-1.8,6) 42(-2.7,6) 43(-3.6,6) 44(-4.5,6)
  silkscreen extent -6.1,-6.1 6.1,6.1
XTAL-2520 [mm]
  rrect25% 1x0.9 smd mask+0.051: 1(-0.85,-0.7)
  rect 1x0.9 smd mask+0.051: 2(0.85,-0.7) 3(0.85,0.7) 4(-0.85,0.7)
  silkscreen extent -1.32,-1.07 1.32,1.07, body extent -1.26,-1 1.24,1, height 0.55

## Part data
C1 C2 C3 C4 C6 C7 C8 C9 C10 C11 C12 C36 C37 C38 C39 C40 C41 C42 C43 C44 C46 C49 C52 C64 C70 C71 C91 C93: library part CAP, "Capacitor"
C5 C13 C53 C78 C79 C80 C102 C103 C104 C105 C110 C111 C113: library part C_0402, Add into BOM=yes, Convert to PCB=yes, Device=C_0402, FootprintName="CAP_0402 - G", ModelTransform=v2:[39.37007874015748,-9.642888182262625e-15,0,9.642888182262625e-15,39.37007874015748,0,0,0,39.37007874015748,0.0034,0.0032,0.5], Origin 3D Model Title=CAPC1005X05L, Origin Footprint="CAP_0402 - G", PCB Layer=Default, Symbol=CAP
C45 C60 C84 C94 C95: library part CAP
C47 C48 C61 C67 C68: library part CL05A225MQ5NSNC, "容值:2.2uF;精度:±20%;额定电压:6.3V;温度系数:X5R;", JLCPCB Part Class="Basic Part", LCSC Part Name="2.2uF ±20% 6.3V", Manufacturer=SAMSUNG(三星), Temperature Coefficient=X5R, Tolerance=±20%, Voltage Rating=6.3V, 3D Model=36a51122f27c49738f86b3bfa98863e0聨0819f05c4eef4c71ace90d822a990e87, 3D Model Transform=39.37,19.685,0,0,0,0,0,0,0, Add into BOM=yes, Convert to PCB=yes, Datasheet=https://item.szlcsc.com/datasheet/CL05A225MQ5NSNC/13164.html, Device=CL05A225MQ5NSNC, FootprintName=C0402-NSK, Manufacturer Part=CL05A225MQ5NSNC, ModelName=C0402_L1.0-W0.5-H0.5, PCB Layer=Default, Supplier=LCSC, Supplier Footprint=0402, Supplier Part=C12530, Symbol=Capacitance
C51: library part CM, "Cap SMD"
C54 C55: library part cap
C62 C69 C72: library part CL05A105KA5NQNC, "容值:1uF;精度:±10%;额定电压:25V;温度系数:X5R;", JLCPCB Part Class="Basic Part", LCSC Part Name="1uF ±10% 25V", Manufacturer=SAMSUNG(三星), Temperature Coefficient=X5R, Tolerance=±10%, Voltage Rating=25V, 3D Model=36a51122f27c49738f86b3bfa98863e0聨0819f05c4eef4c71ace90d822a990e87, 3D Model Transform=39.37,19.685,0,0,0,0,0,0,0, Add into BOM=yes, Convert to PCB=yes, Datasheet=https://item.szlcsc.com/datasheet/CL05A105KA5NQNC/53938.html, Device=CL05A105KA5NQNC, FootprintName=C0402-NSK, Manufacturer Part=CL05A105KA5NQNC, ModelName=C0402_L1.0-W0.5-H0.5, PCB Layer=Default, Supplier=LCSC, Supplier Footprint=0402, Supplier Part=C52923, Symbol=Capacitance
C63: library part CL05A106MQ5NUNC, "容值:10uF;精度:±20%;额定电压:6.3V;温度系数:X5R;", JLCPCB Part Class="Basic Part", LCSC Part Name="10uF ±20% 6.3V", Manufacturer=SAMSUNG(三星), Temperature Coefficient=X5R, Tolerance=±20%, Voltage Rating=6.3V, 3D Model=36a51122f27c49738f86b3bfa98863e0聨0819f05c4eef4c71ace90d822a990e87, 3D Model Transform=39.37,19.685,0,0,0,0,0,0,0, Add into BOM=yes, Convert to PCB=yes, Datasheet=https://item.szlcsc.com/datasheet/CL05A106MQ5NUNC/16204.html, Device=CL05A106MQ5NUNC, FootprintName=C0402-NSK, Manufacturer Part=CL05A106MQ5NUNC, ModelName=C0402_L1.0-W0.5-H0.5, PCB Layer=Default, Supplier=LCSC, Supplier Footprint=0402, Supplier Part=C15525, Symbol=Capacitance
C65 C73 C74 C75 C76 C77: library part CL05B104KO5NNNC, "容值:100nF;精度:±10%;额定电压:16V;温度系数:X7R;", JLCPCB Part Class="Basic Part", LCSC Part Name="100nF ±10% 16V", Manufacturer=SAMSUNG(三星), Temperature Coefficient=X7R, Tolerance=±10%, Voltage Rating=16V, 3D Model=36a51122f27c49738f86b3bfa98863e0聨0819f05c4eef4c71ace90d822a990e87, 3D Model Transform=39.37,19.685,0,0,0,0,0,0,0, Add into BOM=yes, Convert to PCB=yes, Datasheet=https://item.szlcsc.com/datasheet/CL05B104KO5NNNC/1877.html, Device=CL05B104KO5NNNC, FootprintName=C0402-NSK, Manufacturer Part=CL05B104KO5NNNC, ModelName=C0402_L1.0-W0.5-H0.5, PCB Layer=Default, Supplier=LCSC, Supplier Footprint=0402, Supplier Part=C1525, Symbol=Capacitance
C66: library part CL10A226MQ8NRNC, "容值:22uF;精度:±20%;额定电压:6.3V;温度系数:X5R;", JLCPCB Part Class="Basic Part", LCSC Part Name="22uF ±20% 6.3V", Manufacturer=SAMSUNG(三星), Temperature Coefficient=X5R, Tolerance=±20%, Voltage Rating=6.3V, 3D Model=ac125912035d415993ca9572d50418b1, 3D Model Transform=62.992,31.496,0,0,0,0,0,0,0, Add into BOM=yes, Convert to PCB=yes, Datasheet=https://item.szlcsc.com/datasheet/CL10A226MQ8NRNC/60514.html, Device=CL10A226MQ8NRNC, FootprintName=C0603-NSK, Manufacturer Part=CL10A226MQ8NRNC, ModelName=C0603_L1.6-W0.8-H0.8, PCB Layer=Default, Supplier=LCSC, Supplier Footprint=0603, Supplier Part=C59461, Symbol=Capacitance
D1 D3: library part ESD5341N, "ESD二极管-单向"
D2: library part LED_0402, "LED"
D4 D5 D12 D19 D110 D111 D112 D113: "ESD二极管-单向"
D6 D7 D8 D9: library part H5VND5B, "ESD二极管-单向"
D11: library part DSK110
D100: library part 1N5819WS_C191023, "电压:40V 电流:1A / 正向压降(Vf):600mV@1A / 直流反向耐压(Vr):40V / 整流电流:1A / 型号:1N5819WS_C191023 / LCSC C191023 / 厂牌:Hottech(合科泰)"
IC1: "Integrated Circuit", Manufacturer_Name=STMicroelectronics, Mouser Part Number=511-LSM6DS3TR-C, Arrow Part Number=LSM6DS3TR-C, Arrow Price/Stock=https://www.arrow.com/en/products/lsm6ds3tr-c/stmicroelectronics?region=nac, Datasheet Link=http://www.st.com/resource/en/datasheet/lsm6ds3tr-c.pdf, Manufacturer_Part_Number=LSM6DS3TR-C, Mouser Price/Stock=https://www.mouser.co.uk/ProductDetail/STMicroelectronics/LSM6DS3TR-C?qs=u4fy%2FsgLU9NHwPlhP3LTBw%3D%3D
IPEX1: library part 2.4G天线, "SMA-板载2.4G射频天线https://item.szlcsc.com/3441431.html?fromZone=s_s__%2522ipex1%2522", BOM名称=板载2.4G射频天线, 学习资源=www.ooocke.com, 版权归属=源创客
J1 J2: library part "Header 4", "Header, 4-Pin", LatestRevisionDate=17-Jul-2002, LatestRevisionNote="Re-released for DXP Platform.", Publisher="Altium Limited"
J3 J10: library part USB_C
J4: library part TF_Card, "TF卡座", BOM名称=TF卡座, 学习资源=www.ooocke.com, 版权归属=源创客
JP2: library part FPC-30P, "FPC连接器", BOM名称=FPC连接器, 学习资源=www.ooocke.com, 版权归属=源创客
L1 L3: library part Inductor, "贴片功率电感 2.2uH-20%-252010(2.5*2.0*1.0mm)", Code_IEC=1005, Code_JEITA=0402, LatestRevisionDate=17-Jul-2002, LatestRevisionNote="Re-released for DXP Platform.", PackageReference=0402-A, Published=8-Jun-2000, Publisher="Altium Limited"
L2: library part INDUCTOR
Q10: library part AO3401A_C15127, "1个P沟道 耐压:30V 电流:4A / 数量:1个P沟道 / 漏源电压(Vdss):30V / 连续漏极电流(Id):4A / 导通电阻(RDS(on)):47mΩ@10V；85mΩ@2.5V；60mΩ@4.5V / 耗散功率(Pd):- / 阈值电压(Vgs(th)):900mV / 型号:AO3401A_C15127 / LCSC C15127 / 厂牌:AOS"
Q11: library part 2N7002,215, "1个N沟道 耐压:60V 电流:300mA / 数量:1个N沟道 / 漏源电压(Vdss):60V / 连续漏极电流(Id):300mA / 导通电阻(RDS(on)):5Ω@10V / 耗散功率(Pd):830mW / 阈值电压(Vgs(th)):2.5V / 型号:2N7002,215 / LCSC C65189 / 厂牌:Nexperia(安世)"
R1 R4 R11 R13 R15 R38 R39: library part Res2, "Resistor"
R2 R3 R5 R6 R14 R17 R20 R21 R23 R24 R25 R26 R27 R47 R48 R70: library part RES, "普通电阻"
R7 R8 R16 R100 R101 R104 R105 R106 R107 R108 R110 R111 R112 R113 R117 R118 R120 R121: library part R_0402, Add into BOM=yes, Convert to PCB=yes, Device=R_0402, FootprintName="RES_0402 -G", ModelTransform=v2:[39.37007874015748,-9.642888182262625e-15,0,9.642888182262625e-15,39.37007874015748,0,0,0,39.37007874015748,0.0034,0.0033,0], Origin 3D Model Title=RESC1005X03L, Origin Footprint="RES_0402 -G", PCB Layer=Default, Symbol=RES
R12: library part Res2, "10K 热敏电阻"
SW1 SW2 SW3 SW4: "4*5*3.4H-J 180gf 笑脸PPA / 电路结构:单刀单掷 / 按钮形状:圆形按钮 / 作用力:1.8N / 安装方式:卧贴 / 开关长度:4.5mm / 开关宽度:3.4mm / 开关高度:3.4mm / 带支架:带支架 / 触点电流:50mA / 额定电压:12V / 带灯:无 / 工作寿命:- / 型号:TSA020A3418A / LCSC C2888437 / 厂牌:BZCN(博众电气)"
U2: library part SGM358
U3: "配套排针：HX PZ2.54-1x8P系列 1x8P 间距:2.54mm 卧贴 / 插孔结构:1x8P / 间距:2.54mm / 行距:- / 圆孔/方孔:方孔 / 安装方式:卧贴 / 排数:单排 / 总孔位数:8P / 额定电流:3A / 额定电压:1kV / 插孔方向:顶部 / 塑高:8.5mm / 触头材质:黄铜 / 触头镀层:金 / 工作温度:-40℃~+105℃ / 型号:HX PM2.54-1x8P WT / LCSC C46061772 / 厂牌:hanxia(韩下)"
U4: "A PMU designed by Allwinner", JLCPCB Part Class=扩展库, Manufacturer=x-powers, Add into BOM=yes, Convert to PCB=yes, Device=AXP2101, LCSC Part Name=AXP2101, Manufacturer Part=AXP2101, Supplier=LCSC, Supplier Footprint=QFN-40-EP(5x5), Supplier Part=C3036461, Symbol=AXP2101
U5: library part F101, Add into BOM=yes, Convert to PCB=yes, Device=F101, FootprintName=QFN-68_L7.0-W7.0-P0.35-TL-EP4.5, ModelId=f133f686dbbc4c2a801de1546189e211聨0819f05c4eef4c71ace90d822a990e87, ModelName=QFN-68_L7.0-W7.0-P0.35-TL-EP4.5, ModelTransform=276.3773992490768,276.3773992490768,30.70859960693866,0,0,0,0,0,0, PCB Layer=Default, Symbol=F101
U6: library part AIC8800D80_SDIO_LGA44, "AIC8800D80 SDIO WiFi/BT module, LGA-44. Symbol from YuzukiNeko baseboard U3; footprint from BL-M8800MT1-40B - verify against module datasheet", Add into BOM=yes, Convert to PCB=yes, Device=AIC8800D80_SDIO_LGA44, FootprintName=WIRELM-SMD_BL-M8800MT1-40B, PCB Layer=Default, Symbol=AIC8800D80_SDIO_LGA44
U8: library part MT9284-28J
U10: "USB转串口芯片CH340 / 应用功能:收发器 / USB协议版本:USB 2.0 / 数据速率:2Mbps / 型号:CH340E / LCSC C99652 / 厂牌:WCH(南京沁恒)"
U13: library part ICS-43434_C5656610, "1.65V~3.63V 停产 / 指向性:全指向 / 信噪比:64dB / 灵敏度:-26dB / 阻抗:- / 型号:ICS-43434_C5656610 / LCSC C5656610 / 厂牌:TDK InvenSense(应美盛)"
U15: "1.2V 300mA 6V / 输出极性:正极 / 工作电压:6V / 输出电压:1.2V / 输出电流:300mA / 电源纹波抑制比(PSRR):70dB@(1kHz) / 输出类型:固定 / 型号:ME6211C12M5G-N / LCSC C236672 / 厂牌:MICRONE(南京微盟)"
Y1: library part XTAL, "24Mhz"

## Via types
v1: diameter 17.99, hole 12, Top Layer to Bottom Layer, tented both sides, 383 vias
v2: diameter 15.75, hole 11.81, Top Layer to Bottom Layer, tented both sides, 204 vias
v3: diameter 18, hole 12, Top Layer to Bottom Layer, tented both sides, 50 vias

## Nets (pads, with @x,y where several pads share a name; then routed paths per layer and width w, separated by ;. In a path a pad name is that pad's centre, name@x,y a point inside that pad or via, vN(x,y) a via of type N, cw(c..) or ccw(c..) an arc to the next point about the centre after c; other vN are vias at no path point)
3V3_EXT: C4.2 C110.1 U3.5 U4.16 | length 1364.5
  Top Layer w6: C110.1@2321,1583 2338.72,1565.28 U4.16@2373.65,1565.28
  Top Layer w20: v2(2206,961) 2189,944 2189,659.94 2211.53,637.42 2211.53,593.35 2235,569.88 U3.5@2235,429.45 ; v2(2259.4,1611.14) 2293.44,1611.14 2321,1583.58 C110.1@2321,1583
  Bottom Layer w20: v2(2206,961) 2207.76,961 2258,1011.24 2258,1609.73 v2(2259.4,1611.14)
ALDO1V8: C91.2 R6.1 R7.1 U4.18 | length 1836.4
  Top Layer w6: v2(2295,1496) 2296,1496 2298,1498 2300.95,1498 C91.2@2321.27,1518.32 2325.87,1522.91 2340.27,1522.91 2351.14,1533.78 U4.18@2373.65,1533.78
  Top Layer w12: R6.1@1969,1895 2125,1895 v2(2128,1892) ; v2(2710,2485) 2711,2486 R7.1@2740,2486
  Bottom Layer w12: v2(2128,1892) 2136.9,1883.13 2407,1883.13 ; v2(2295,1496) 2295,1688 2407,1800 2407,1883.13 ; v2(2710,2485) 2710,2002 2591.13,1883.13 2407,1883.13
AVCC: C63.2 C65.2 U5.56 | length 155.7
  Top Layer w6: C65.2@1529.44,1790 C63.2@1529.44,1757 1585,1757 1607.88,1734.12 U5.56@1642.69,1734.12
AXP_IIC_IRQ: R15.1 U4.38 U5.53 | length 2454.1
  Top Layer w6: v2(1479.81,1832.93) 1543.01,1832.93 1600.48,1775.46 U5.53@1642.69,1775.46 ; v2(2560,2134) 2560,1969.98 2660.27,1869.71 R15.1@2660.27,1701.32 2636.5,1701.32 2613.05,1677.87 2613.05,1630.05 2595.52,1612.52 U4.38@2570.45,1612.52
  Bottom Layer w6: v2(1479.81,1832.93) 1478.55,1834.18 1478.55,2153.55 1643,2318 2070,2318 2114.5,2273.5 2114.5,2139.5 2135.87,2118.13 2544.13,2118.13 v2(2560,2134)
AXP_IIC_SCL: C55.2 IC1.13 JP2.6 R47.2 U4.40 U5.2 | length 2828.8
  Top Layer w6: v2(1336.69,998.79) 1336.69,1171.69 1673.24,1508.24 1673.24,1521.02 1680.21,1527.99 1680.21,1544.36 U5.2@1680.54,1544.69 ; v2(1699.89,999.7) 1700.23,999.35 1751.51,999.35 JP2.6@1751.85,999.01 ; R47.2@1870,1032 1891,1053 1891,1110.68 1910.35,1130.03 1910.35,1369.79 1921,1380.44 v2(1921,1383) ; v2(1946,1030) 1965,1049 IC1.13@2013.07,1049 ; v2(2200.18,1383.06) 2200.18,1595.75 2368.45,1764.03 2542.49,1764.03 2579.26,1727.26 2579.26,1644.88 2578.39,1644.02 U4.40@2570.45,1644.02
  Top Layer w8: JP2.6@1751.85,999.01 C55.2@1870,999 R47.2@1870,1032
  Bottom Layer w6: v2(1336.69,998.79) 1337.15,999.24 1699.43,999.24 v2(1699.89,999.7) ; v2(1872,1018) 1884,1030 v2(1946,1030) ; v2(1921,1383) 2200.12,1383 v2(2200.18,1383.06)
AXP_IIC_SDA: C54.2 IC1.14 JP2.5 R48.2 U4.39 U5.3 | length 2824.6
  Top Layer w6: v2(1357.52,1021.26) 1357.52,1172.52 1689.49,1504.49 1689.49,1520.29 1693.99,1524.8 1693.99,1544.36 U5.3@1694.32,1544.69 ; v2(1715.93,1019.12) 1716.14,1018.91 1751.64,1018.91 JP2.5@1751.85,1018.69 ; C54.2@1870,1099 1876.69,1105.69 1876.69,1113.34 1898.35,1135 1898.35,1392.35 v2(1916,1410) ; v2(1980,1029) 1980.16,1029.16 2012.92,1029.16 IC1.14@2013.07,1029.32 ; v2(2182,1410) 2182,1594.55 2365.97,1778.51 2563.49,1778.51 2601.05,1740.95 2601.05,1635.02 2594.3,1628.27 U4.39@2570.45,1628.27
  Top Layer w8: JP2.5@1751.85,1018.69 1798.57,1018.69 1844.87,1065 R48.2@1870,1065 C54.2@1870,1099
  Bottom Layer w6: v2(1357.52,1021.26) 1358.59,1020.19 1714.86,1020.19 v2(1715.93,1019.12) ; v2(1871,1082) 1927,1082 v2(1980,1029) ; v2(1916,1410) v2(2182,1410)
AXP_PWROK: U4.29
AXP_PWRON: C51.1 R14.2 U4.30 | length 464.9
  Top Layer w6: U4.30@2542.92,1474.75 2542.92,1432.44 2593,1382.36 2593,1260 2661.14,1191.86 C51.1@2794.2,1191.86
AXP_VSYS: C10.1 C11.1 C38.1 C42.2 C43.2 C49.2 Q10.2 R11.2 R120.1 U1.6 U4.17 U4.23 U4.24 U4.34 | length 4111.4
  Top Layer w6: U4.23@2432.68,1474.75 2432.32,1474.39 2432.32,1349.32 C49.2@2428,1345 2448.43,1365.43 U4.24@2448.43,1474.75
  Top Layer w20: U1.6@1214.66,1337 v2(1257.9,1337) ; C10.1@1265,1329.9 1271.73,1323.17 1301.24,1323.17 C11.1@1306,1318.4 ; R120.1@2318,513 2318.6,513.6 Q10.2@2377.72,513.6
  Bottom Layer w20: v2(1257.9,1337) 1036,1337 949,1250 949,442 1058,333 2284,333 2390,439 2390,514 2390,1182 2434.08,1226.08 2434.08,1419.08 2442,1427
  other v2: 2397,514 2439.71,1418.29 2439.94,1440.37 2631.57,1487.44 2658.36,1506.37 2631.34,1513.3 2336.39,1546.33
BT_RST_N: U5.8 U6.34 | length 2328.8
  Top Layer w6: v2(1732,1505) 1732,1504 v2@1735,1501 ; v2@1735,1501.69 1762.3,1528.99 1762.3,1532.93 1763.22,1533.85 U5.8@1763.22,1544.69 ; v2(2155.58,1435.32) 2155.58,1586.58 2410,1841 2410,1916.8 v2(2409.95,1916.85) ; U6.34@2528.9,2696.44 2728.92,2696.44 2737.36,2688 v2(2740,2688)
  Bottom Layer w6: v2(1732,1505) 1803,1434 2154.26,1434 v2(2155.58,1435.32) ; v2(2409.95,1916.85) 2410.09,1917 2591,1917 2691,2017 2691,2639 v2(2740,2688)
CC1_2: J10.A5 R100.1 | length 114.2
  Top Layer w6: R100.1@2646,299 2653,306 2660.84,306 2681,326.16 2681,343 2688.01,350.01 J10.A5@2729.23,350.01
CC2_2: J10.B5 R101.1 | length 97.8
  Top Layer w6: R101.1@2648,508 2661.64,494.36 2665.48,494.36 2678.58,481.26 ; 2678.58,481.22 2691.69,468.12 J10.B5@2729.23,468.12
CH_RXD: U5.67 U10.9 | length 1202.6
  Top Layer w6: v2(1616.36,1547.44) 1615,1548.8 1615,1569.63 1627.58,1582.21 1642.36,1582.21 U5.67@1642.69,1582.54 ; v2(1974.8,1136.15) 2144.88,1136.15 2388.32,892.71 U10.9@2388.32,855.07
  Bottom Layer w6: v2(1616.36,1547.44) 1616.36,1434.7 1887.06,1164 1946.95,1164 v2(1974.8,1136.15)
CH_TXD: U5.66 U10.8 | length 1272.8
  Top Layer w6: v2(1597.34,1532.42) 1596.23,1533.54 1596.23,1567.83 1622.61,1594.21 1624.11,1594.21 1625.89,1595.99 1642.36,1595.99 U5.66@1642.69,1596.32 ; v2(1928.77,1143.95) 1940.82,1156 2142,1156 2408,890 U10.8@2408,855.07
  Bottom Layer w6: v2(1597.34,1532.42) 1596.23,1531.31 1596.23,1437.86 1890.14,1143.95 v2(1928.77,1143.95)
DSI_CLK_N: JP2.19 U5.17 | length 1017
  Top Layer w6: v2(1640.75,900) 1640.75,902.64 1635.87,907.51 1635.87,1035.87 1886.35,1286.35 1886.35,1532.96 1887.24,1533.85 U5.17@1887.24,1544.69 ; v2(1655,758) 1656.87,756.13 1656.87,749.24 1666.85,739.26 1725.74,739.26 1726.68,740.2 1748.94,740.2 JP2.19@1751.85,743.1
  Bottom Layer w6: v2(1640.75,900) 1640.75,897.36 1635.87,892.49 1635.87,837.62 1636,837.5 1636,770.11 1646.24,759.87 1653.13,759.87 v2(1655,758)
DSI_CLK_P: JP2.20 U5.16 | length 1036.9
  Top Layer w6: v2(1619,900) 1619,902.64 1623.87,907.51 1623.87,1040.84 1874.35,1291.32 1874.35,1532.96 1873.46,1533.85 U5.16@1873.46,1544.69 ; v2(1639.62,742.62) 1641.49,740.76 1648.38,740.76 1661.88,727.26 1725.74,727.26 1726.68,726.32 1748.94,726.32 JP2.20@1751.85,723.42
  Bottom Layer w6: v2(1619,900) 1619,897.36 1623.87,892.49 1623.87,832.65 1624,832.53 1624,765.14 1637.76,751.38 1637.76,744.49 v2(1639.62,742.62)
DSI_D0_N: JP2.13 U5.13 | length 1055.8
  Top Layer w6: JP2.13@1751.85,861.21 1748.94,858.31 1726.68,858.31 1725.74,857.37 1528.63,857.37 1507,879 1507,1176.03 1824.2,1493.23 1831.23,1500.26 1831.23,1532.96 1832.12,1533.85 U5.13@1832.12,1544.69
DSI_D0_P: JP2.14 U5.12 | length 1075.6
  Top Layer w6: JP2.14@1751.85,841.53 1748.94,844.43 1726.68,844.43 1725.74,845.37 1523.66,845.37 1495,874.03 1495,1181 1819.23,1505.23 1819.23,1532.96 1818.34,1533.85 U5.12@1818.34,1544.69